# Altium PCB a4403-ELE_PCB.PcbDoc (part 1 of 5)
Units mm, origin at the board's own origin, x right, y up, seen from the top; angles counter-clockwise.
Board outline 160 x 110 mm, 4 copper layers (Top Layer, Int1 (GND), Int2 (PWR), Bottom Layer), stack 1.369 mm thick; 389 components, 298 nets, 1653 pads, 661 vias.
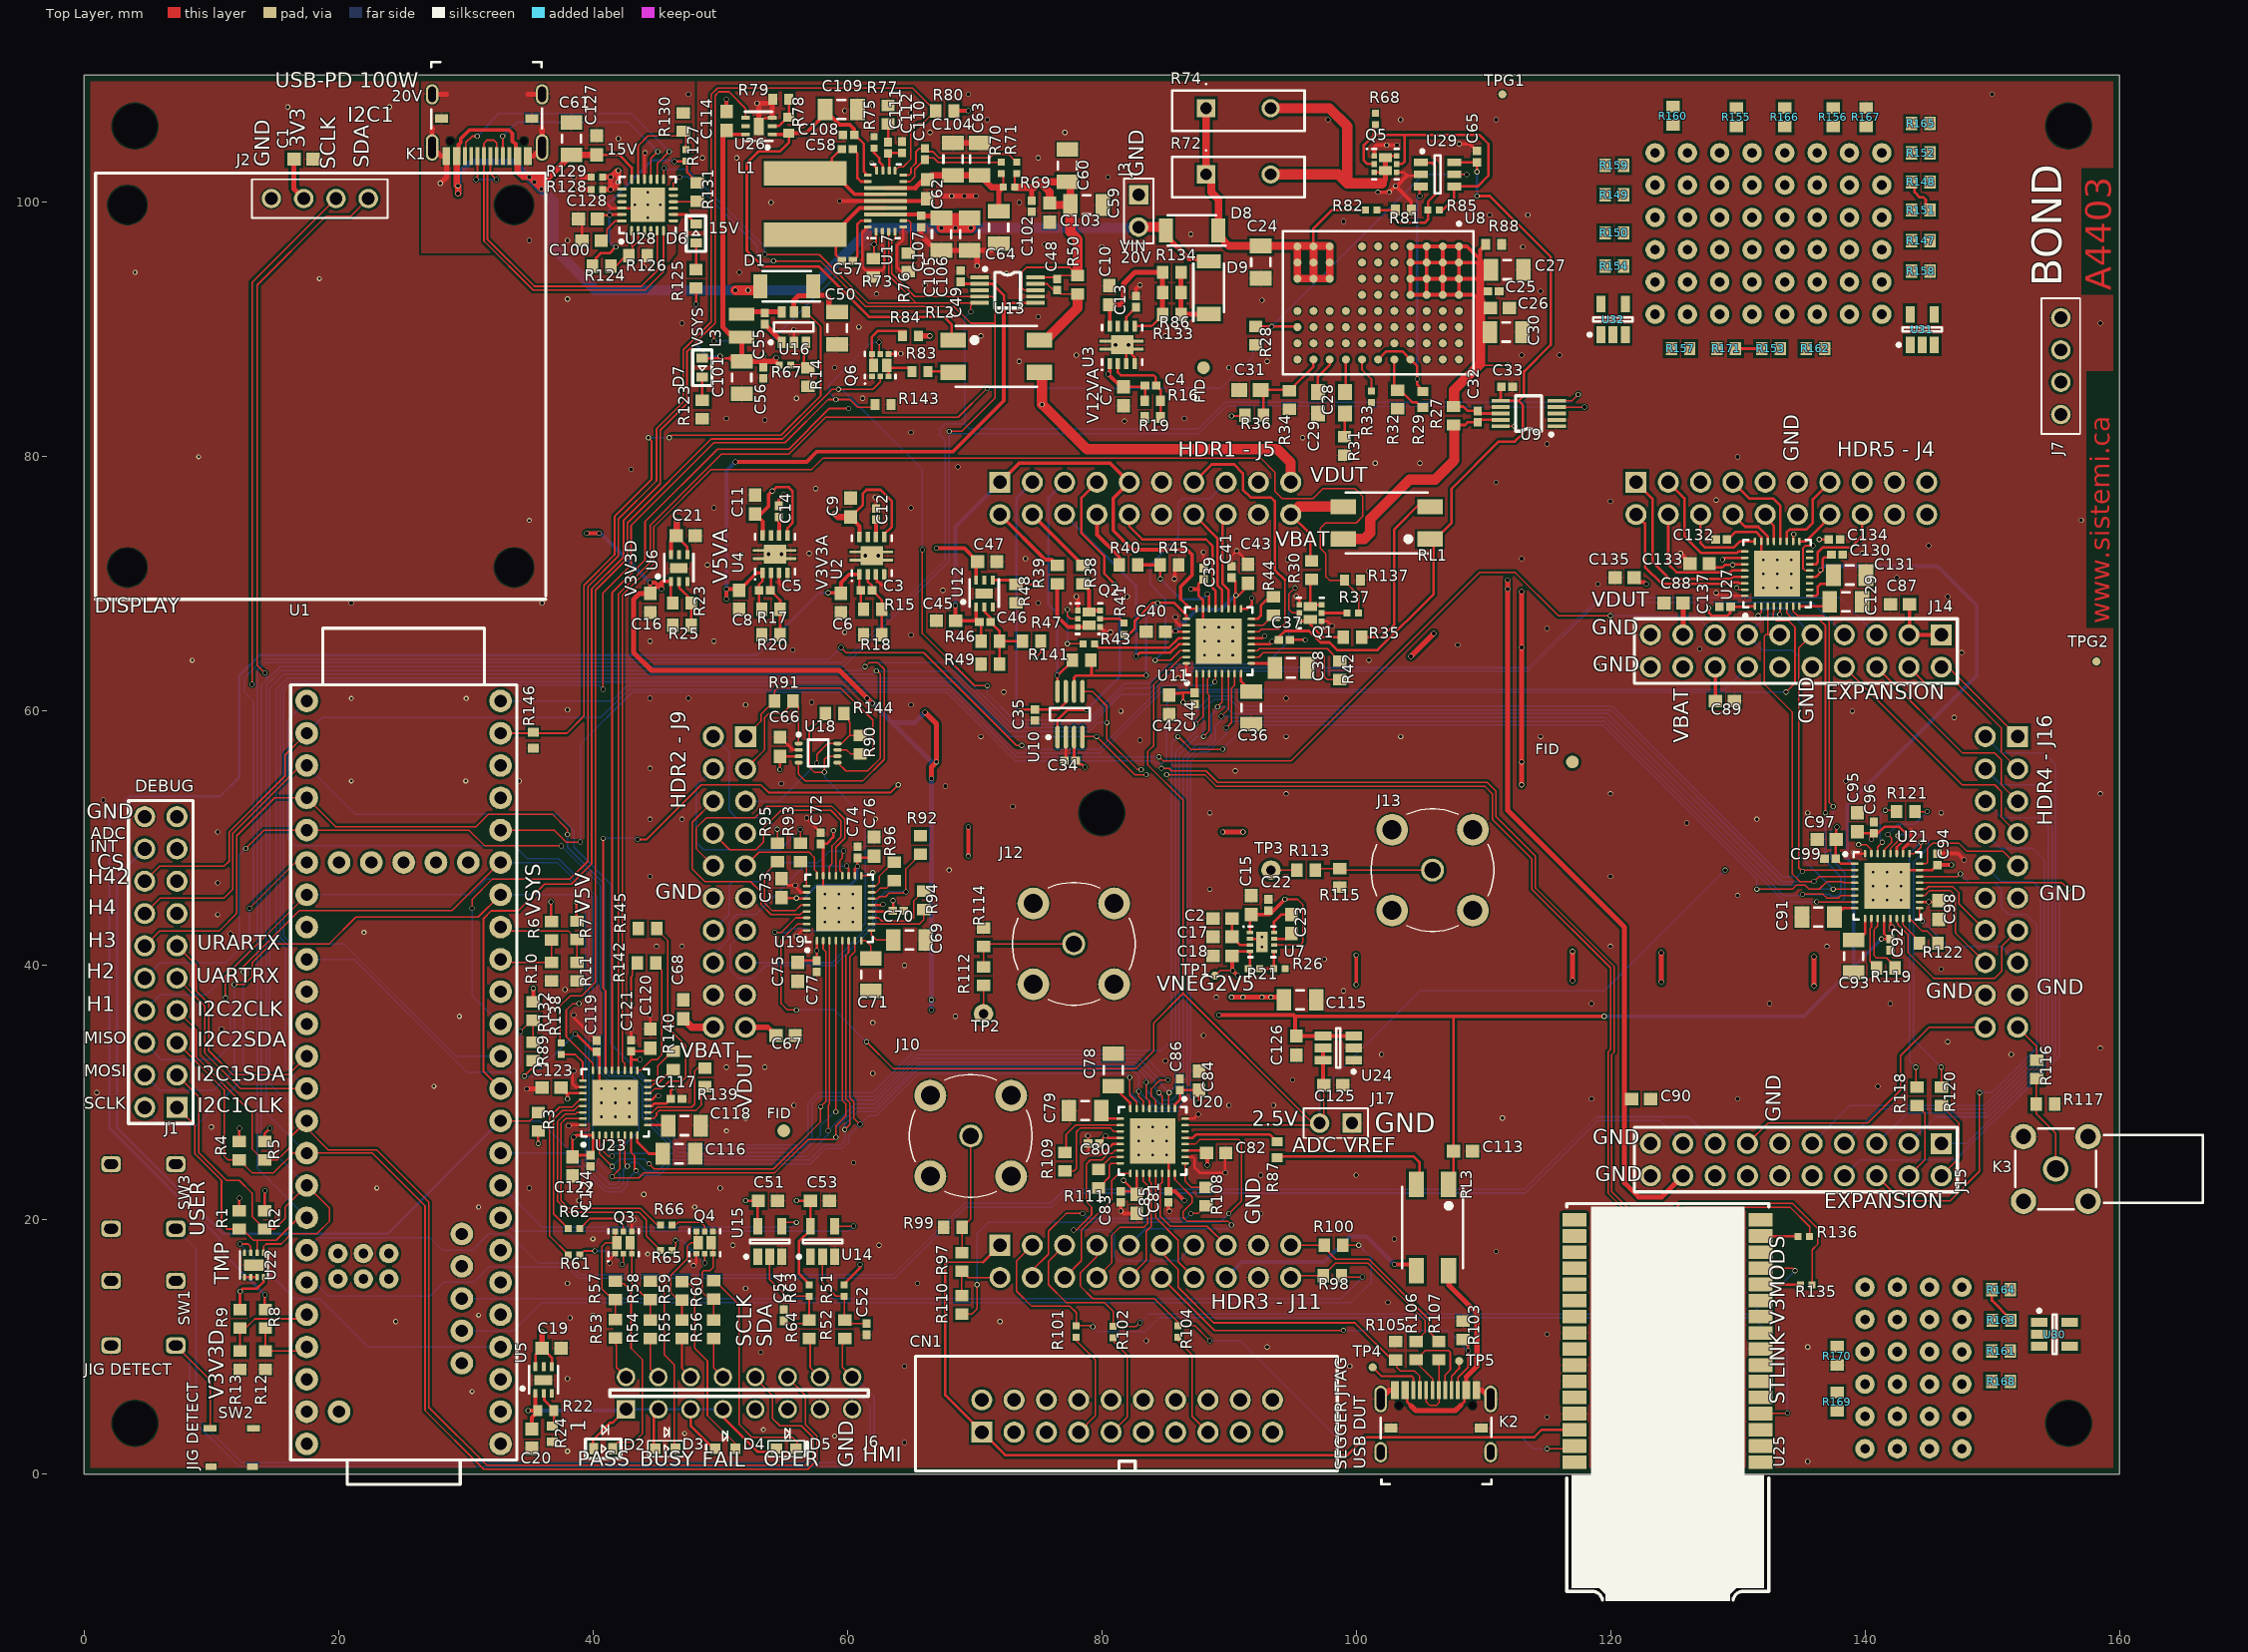
[diagram p0: Top Layer view]
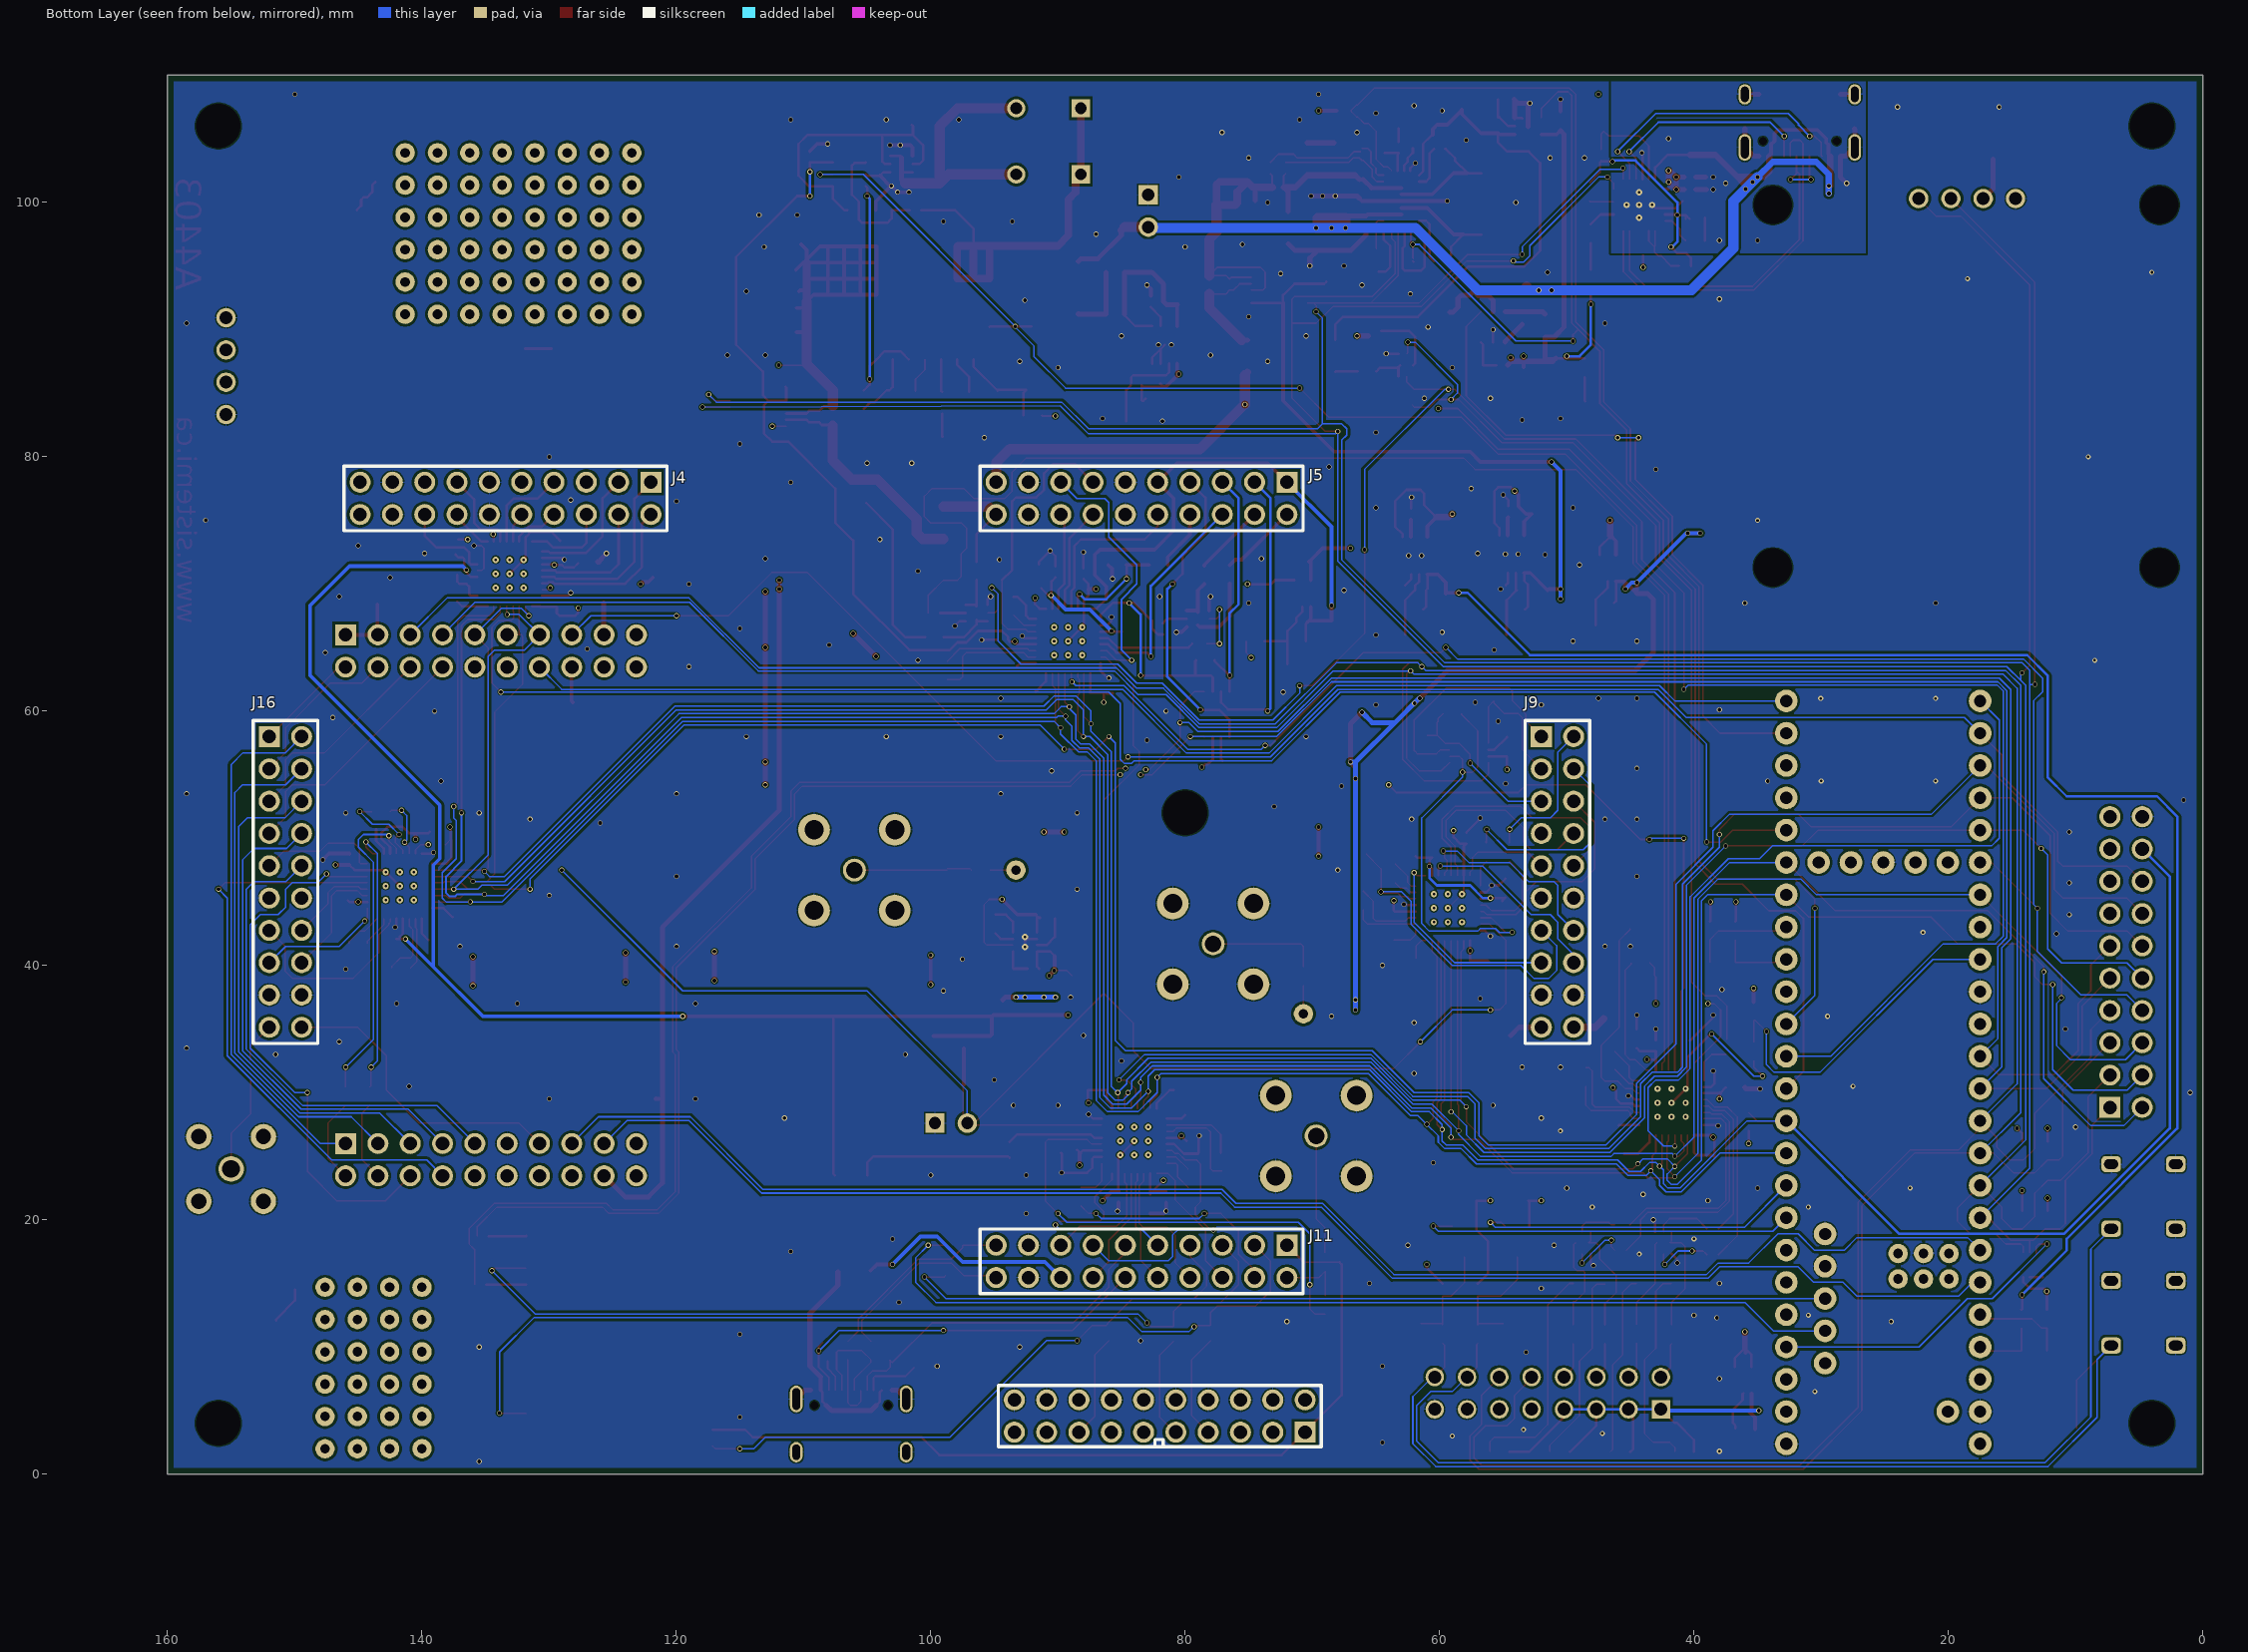
[diagram p1: Bottom Layer view, seen from below]
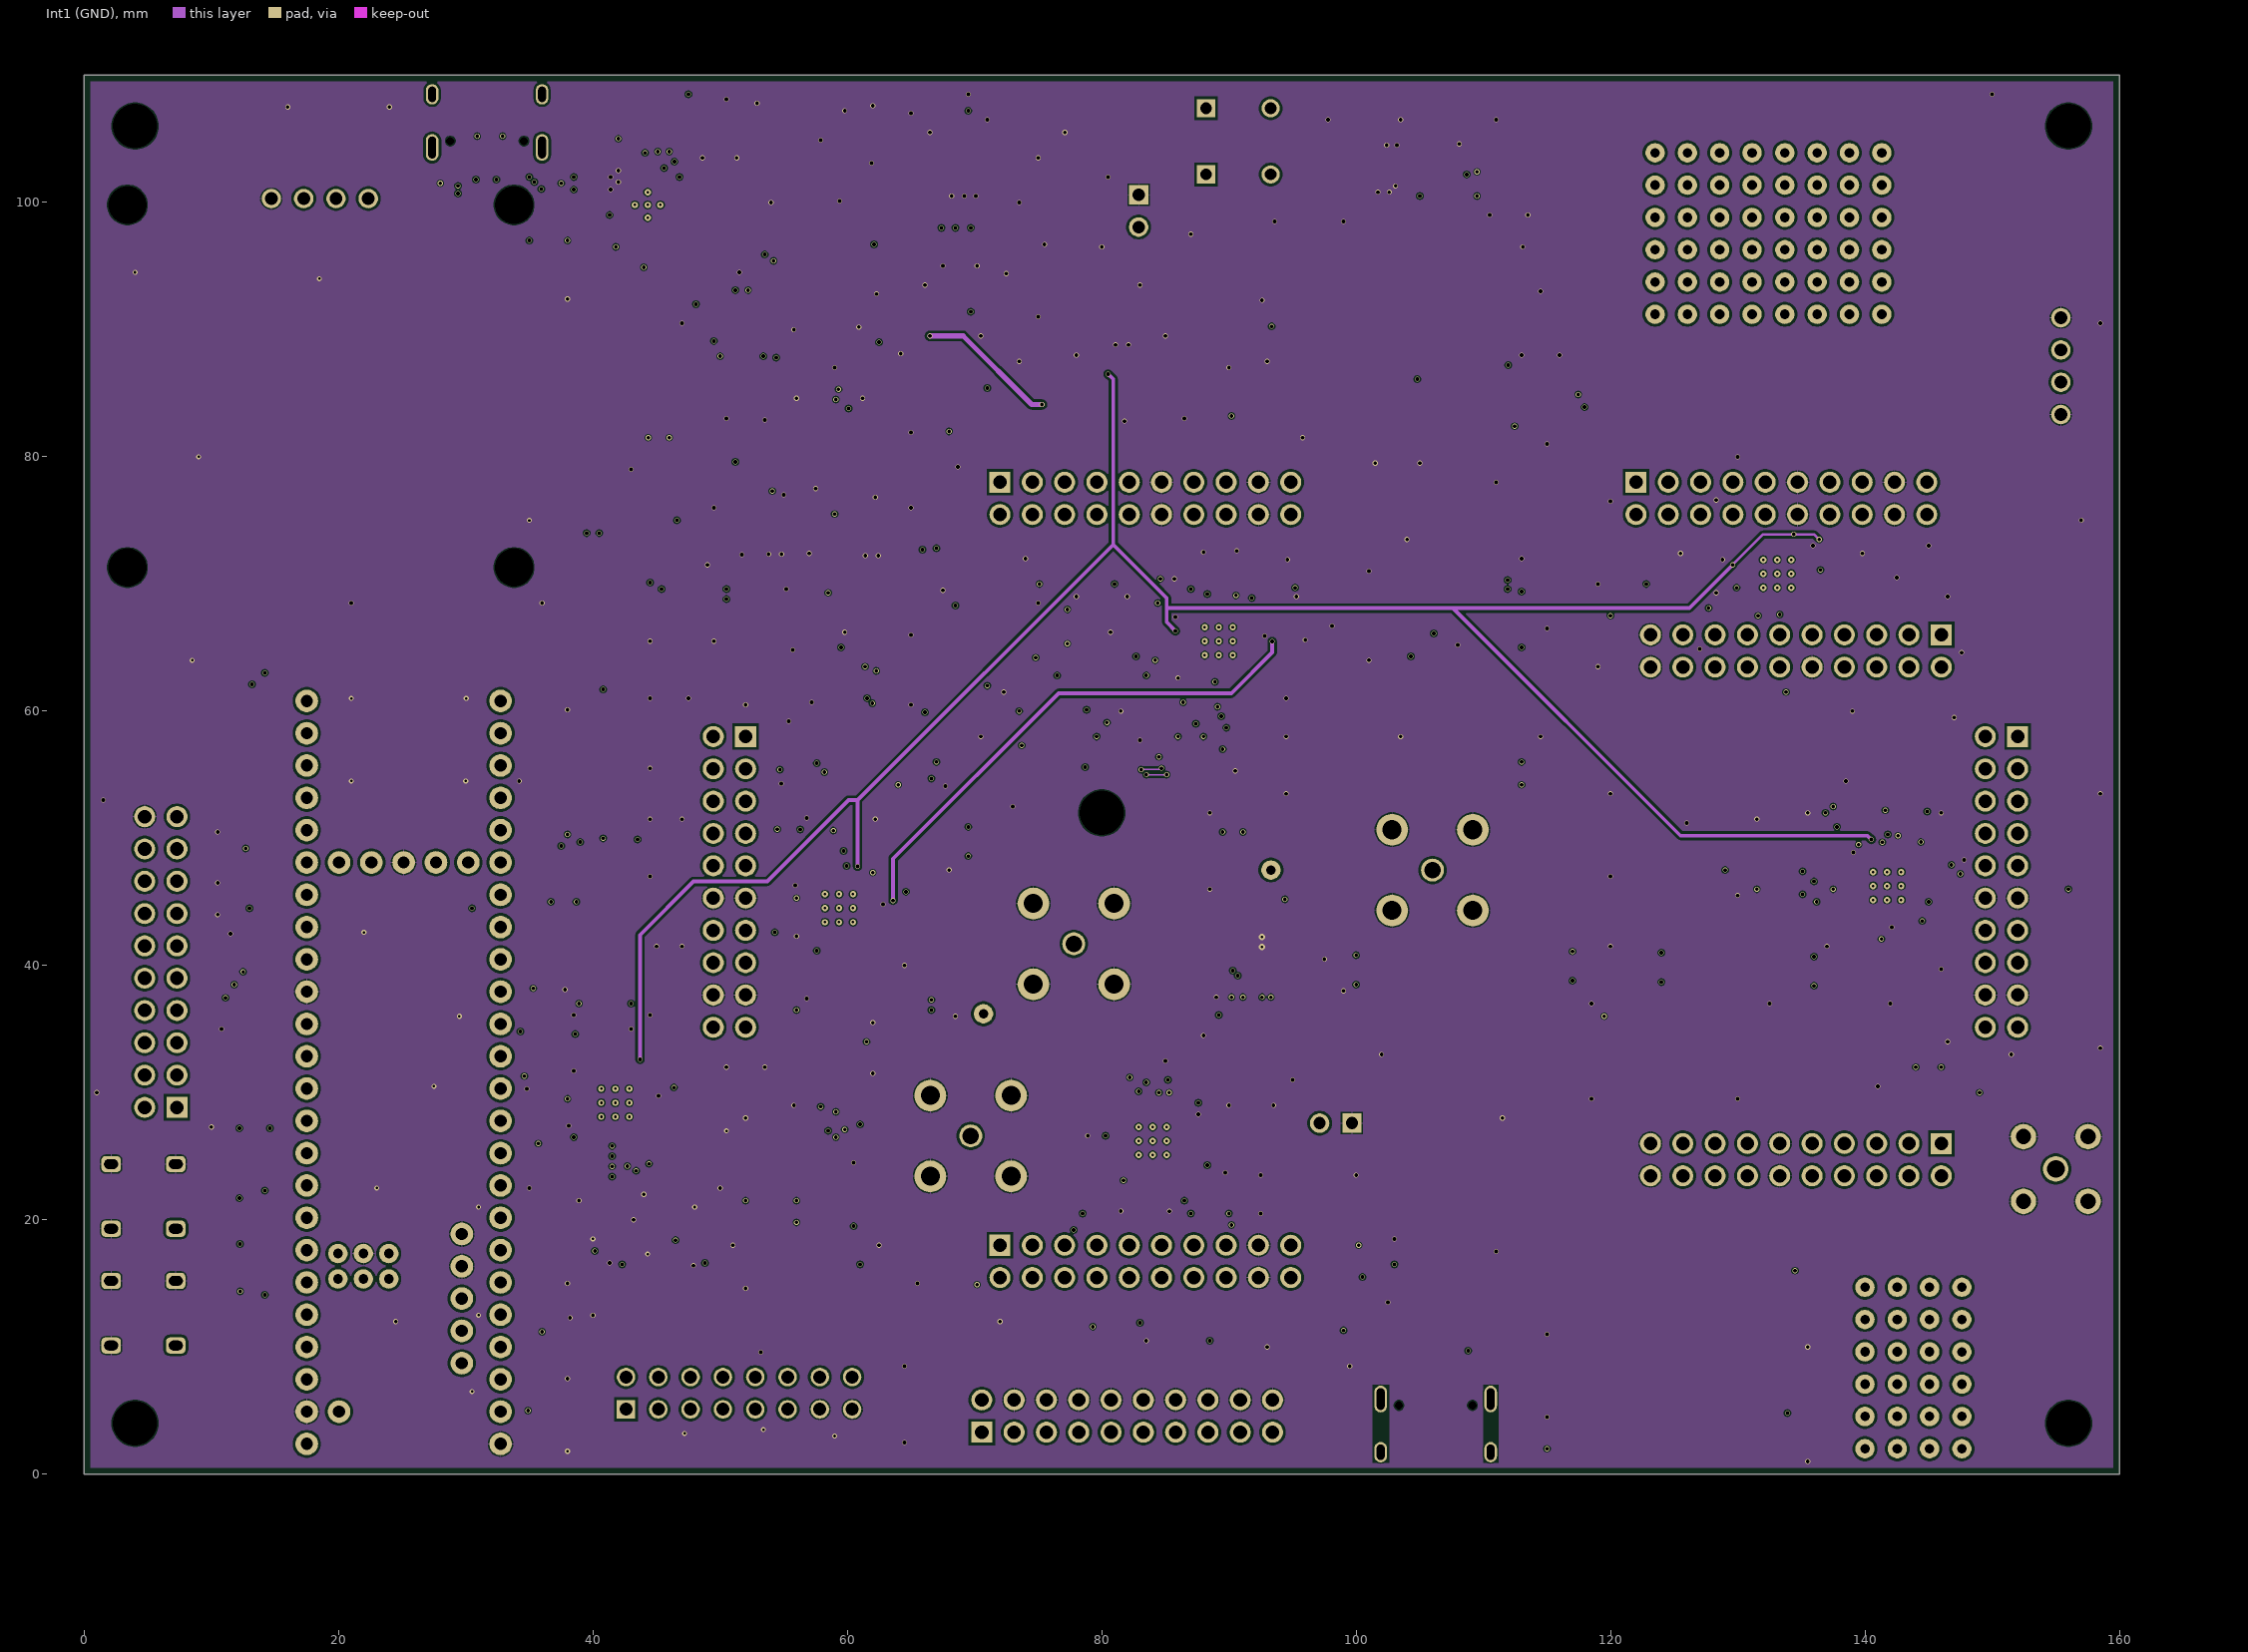
[diagram p2: Int1 (GND)]
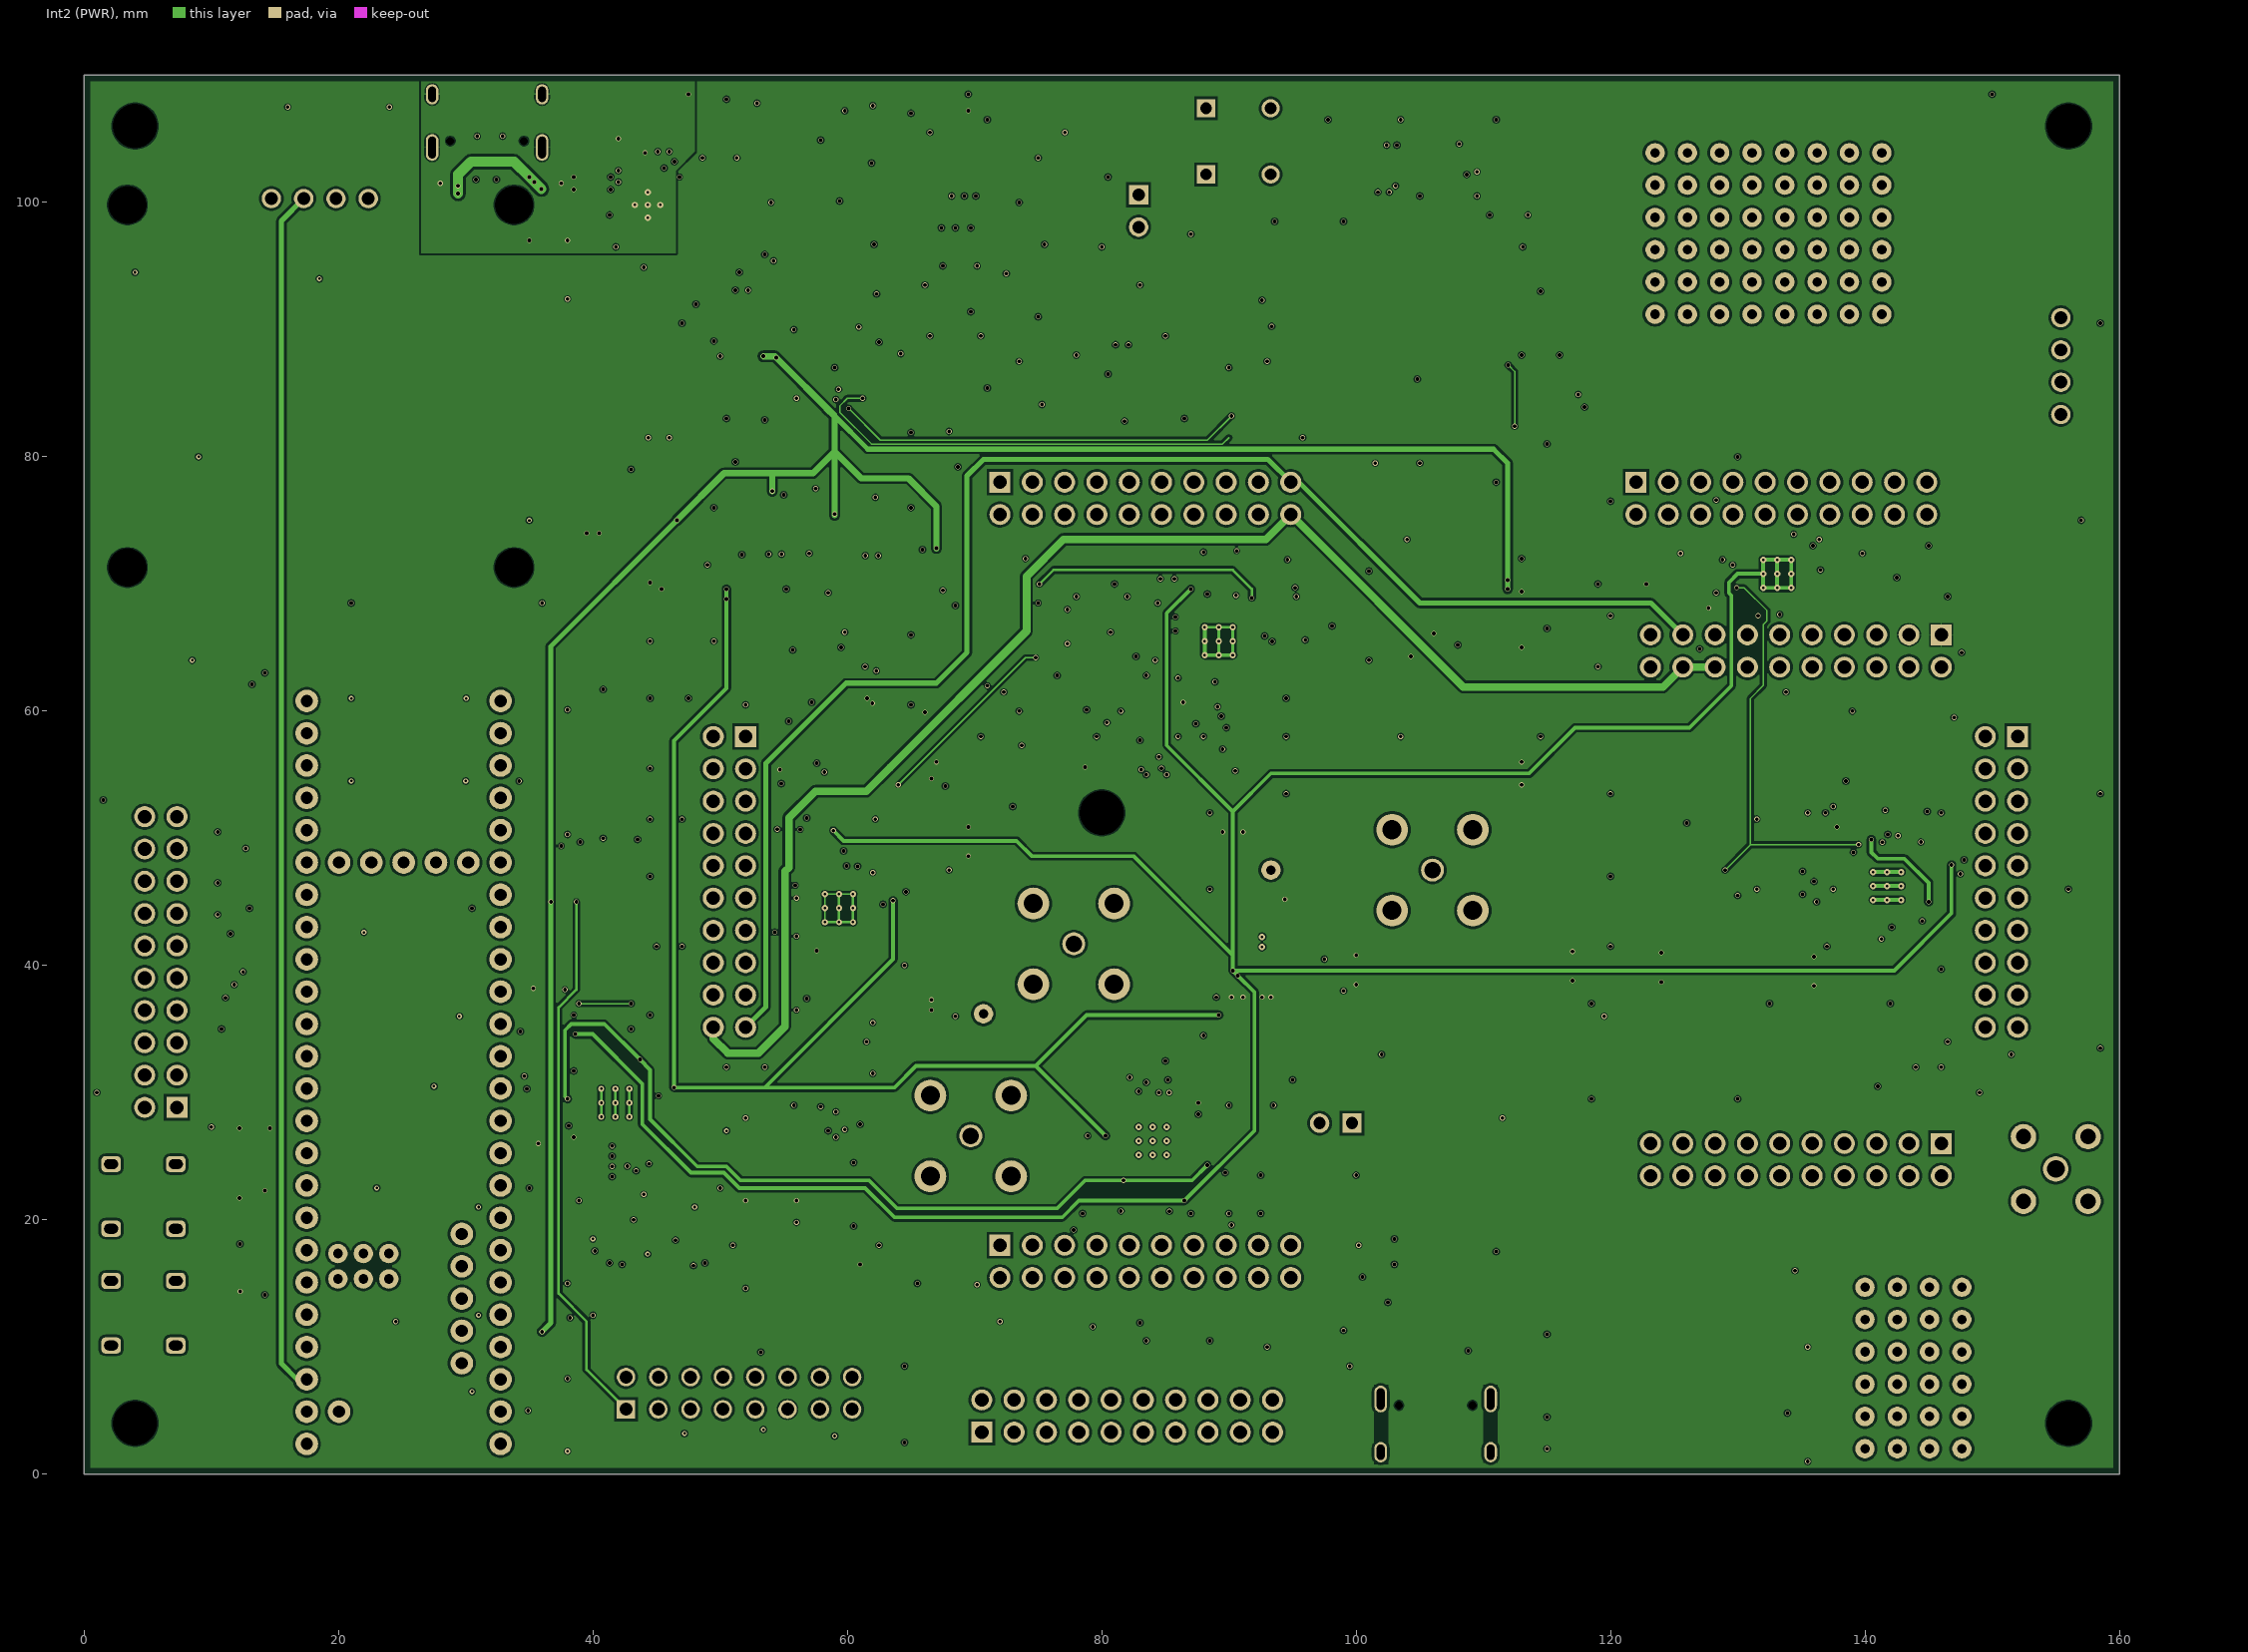
[diagram p3: Int2 (PWR)]
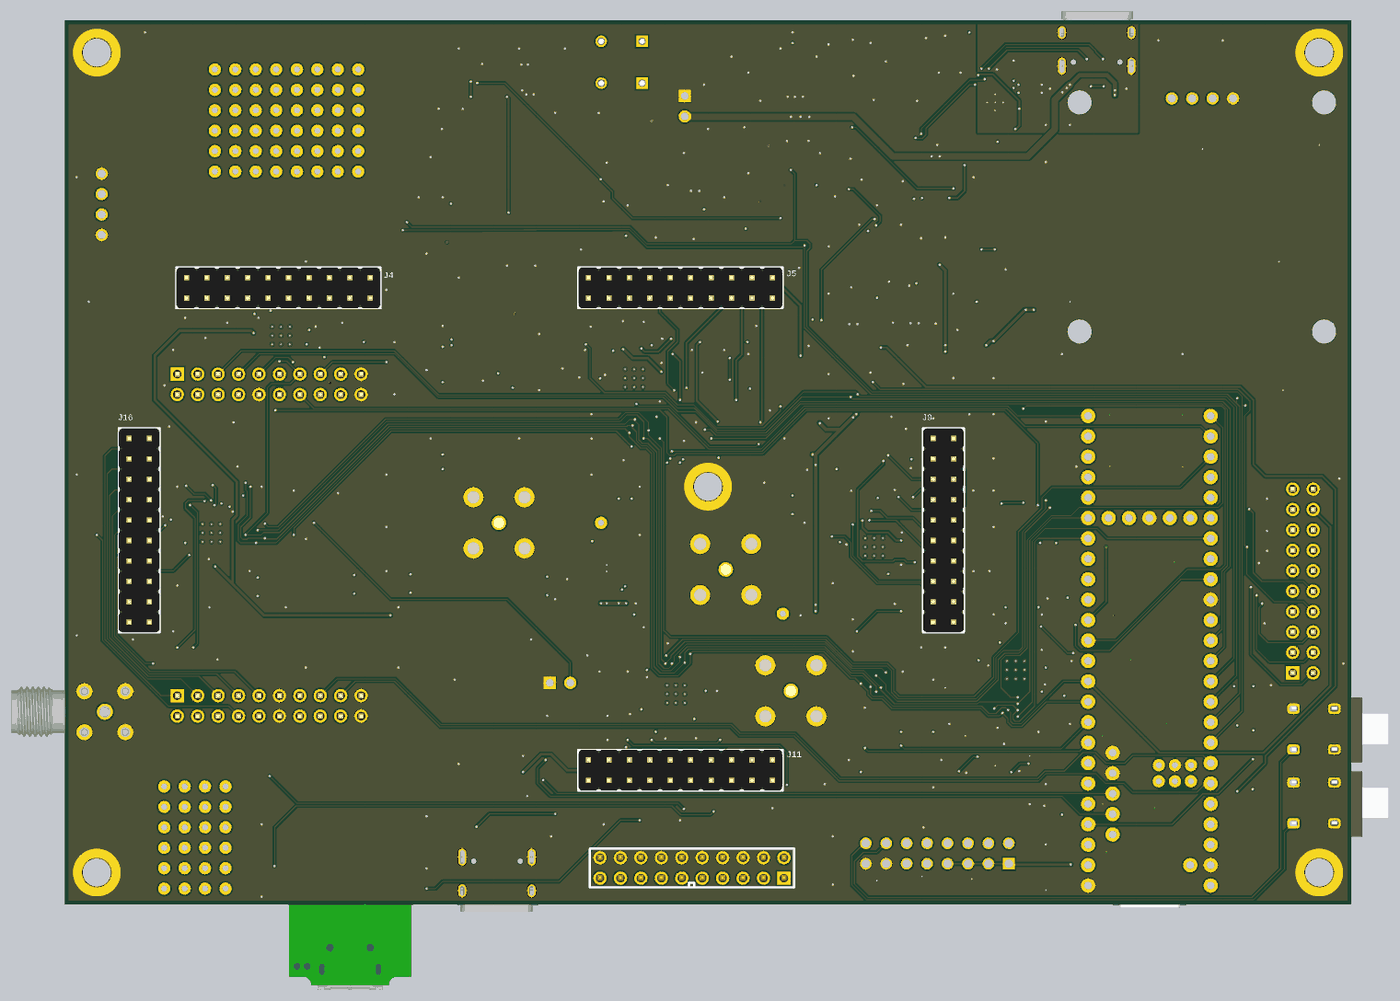
[diagram p7: 3D render of the assembled board from below, using the file's embedded part models]

## Layer stack, top to bottom
Top Solder: solder mask 0.0254, SM-001, Dk 4
Top Layer: signal copper 0.035
Dielectric 1: prepreg 0.1295, PP-017, Dk 4.3
Dielectric 2: prepreg 0.1295, PP-017, Dk 4.3
Int1 (GND): signal copper 0.035
Dielectric 3: core 0.7112, Core-039, Dk 4.8
Int2 (PWR): signal copper 0.035
Dielectric 4: prepreg 0.1295, PP-017, Dk 4.3
Dielectric 5: prepreg 0.1295, PP-017, Dk 4.3
Bottom Layer: signal copper 0.035
Bottom Solder: solder mask 0.0254, SM-001, Dk 4

## Board outline
0,0 0,110 160,110 160,0

## Design rules (kind name [scope] priority, off if disabled: settings)
BoardOutlineClearance [All] p1: gap=0.2 ignorepadtopadclearanceinfootprint=FALSE
Clearance Clearance_PA2 [InComponent('C213') OR InComponent('C215') OR InComponent('C216') OR InComponent('C218')     OR InComponent('C219')     OR InComponent('C220')     OR InComponent('C222')     OR InComponent('C223') OR InComponent('L200') OR InComponent('F200') OR InComponent('Q202') OR InComponent('Q203')OR InComponent('Q204')OR InComponent('Q205')OR InComponent('Q206')OR InComponent('Q207')] p1: gap=0.09 ignorepadtopadclearanceinfootprint=FALSE except(1: SMDPad-SMDPad SMDPad-THPad SMDPad-Via THPad-THPad THPad-Via)
Clearance Clearance_PA [InNet('PA_PST_L')] p2: gap=0.09 ignorepadtopadclearanceinfootprint=FALSE except(1: SMDPad-SMDPad)
Clearance [All] p3: gap=0.09 ignorepadtopadclearanceinfootprint=FALSE except(0.2: Arc-Fill Arc-Poly Arc-Region Track-Fill Track-Poly Track-Region SMDPad-Fill SMDPad-Poly SMDPad-Region THPad-Fill THPad-Poly THPad-Region Fill-Fill Fill-Poly Fill-Region Poly-Poly Poly-Region Region-Region)
HoleSize [All] p1: absolutevalues=TRUE maxlimit=6.3 minlimit=0.15 maxpercent=80.000 minpercent=20.000
MinimumSolderMaskSliver [All] p1: minsoldermaskwidth=0.05
PlaneClearance [All] p1: clearance=0.102
PlaneConnect PlaneConnectPowerPads [InPadClass('PowerPads')] p1: planeconnectstyle=Direct reliefexpansion=0.508 reliefentries=4 reliefconductorwidth=0.254 reliefairgap=0.254
PlaneConnect [All] p2: pad.planeconnectstyle=Relief pad.reliefexpansion=0.3 pad.reliefentries=4 pad.reliefconductorwidth=0.102 pad.reliefairgap=0.102 via.planeconnectstyle=Direct via.reliefexpansion=0.3 via.reliefentries=4 via.reliefconductorwidth=0.127 via.reliefairgap=0.127
PolygonConnect PolygonConnectPABOOST [All vs (InComponent('C410') OR InComponent('C411')  OR InComponent('C412') OR InComponent('C414')) OR (InComponent('C400') OR InComponent('C401')  OR InComponent('C402') OR InComponent('C403')) OR InComponent('J801') OR InComponent('C809') OR InComponent('C813')] p1: connectstyle=Direct reliefconductorwidth=0.254 reliefentries=4 polygonreliefangle="90 Angle" airgapwidth=0.254
PolygonConnect PolygonConnectPowerPads [InNetClass('PWR')] p2: connectstyle=Direct reliefconductorwidth=0.254 reliefentries=4 polygonreliefangle="90 Angle" airgapwidth=0.254
PolygonConnect [All] p3: thpad.connectstyle=Relief thpad.reliefconductorwidth=0.102 thpad.reliefentries=4 thpad.polygonreliefangle="90 Angle" thpad.airgapwidth=0.102 smdpad.connectstyle=Relief smdpad.reliefconductorwidth=0.102 smdpad.reliefentries=4 smdpad.polygonreliefangle="90 Angle" smdpad.airgapwidth=0.102 via.connectstyle=Direct via.reliefconductorwidth=0.127 via.reliefentries=4 via.polygonreliefangle="90 Angle" via.airgapwidth=0.127
RoutingVias [All] p1: holewidth=0.3 width=0.4 viastyle="Through Hole" minholewidth=0.15 minwidth=0.25 maxholewidth=2 maxwidth=10
SilkToSilkClearance [All] p1: silktosilkclearance=0.01
SilkToSolderMaskClearance [IsPad] p1: minsilkscreentomaskgap=0.01 clearancetoexposedcopper=TRUE
SolderMaskExpansion SolderMaskExpansionVia [IsVia] p1: expansion=0.102 istentingtop=TRUE
SolderMaskExpansion [All] p2: expansion=0.05 istentingtop=FALSE
SupplyNets "Schematic Supply Nets_12" [InNet('GNDU')] p1: voltage=0.000
SupplyNets "Schematic Supply Nets_11" [InNet('REF2V5')] p2: voltage=0.000
SupplyNets "Schematic Supply Nets_10" [InNet('V3V3D')] p3: voltage=0.000
SupplyNets "Schematic Supply Nets_9" [InNet('V5V')] p4: voltage=0.000
SupplyNets "Schematic Supply Nets_8" [InNet('GND')] p5: voltage=0.000
SupplyNets "Schematic Supply Nets_7" [InNet('VBAT')] p6: voltage=0.000
SupplyNets "Schematic Supply Nets_6" [InNet('VNEG2V5A')] p7: voltage=0.000
SupplyNets "Schematic Supply Nets_5" [InNet('V5VA')] p8: voltage=0.000
SupplyNets "Schematic Supply Nets_4" [InNet('V12VA')] p9: voltage=0.000
SupplyNets "Schematic Supply Nets_3" [InNet('VSYS')] p10: voltage=0.000
SupplyNets "Schematic Supply Nets_2" [InNet('VDUT')] p11: voltage=0.000
SupplyNets "Schematic Supply Nets_1" [InNet('VIN')] p12: voltage=0.000
SupplyNets "Schematic Supply Nets" [InNet('V3V3A')] p13: voltage=0.000
UnRoutedNet [All] p1: checkbadconnections=TRUE
Width WidthRF [InNetClass('RF')] p1: maxlimit=0.38 minlimit=0.254 preferedwidth=0.38 toplayer_minwidth=0.38 bottomlayer_minwidth=0.38 impedanceprofiledriven=TRUE impedanceprofileid={D1A07D62-F272-47C7-A329-54E711F923DC} minimp=50.000000 maximp=50.000000 favimp=50.000000
Width [All] p2: maxlimit=6 minlimit=0.089 preferedwidth=0.15
23 further rules are at their usual default settings.

## Components (designator, comment, footprint, x,y, rotation, side; value= is the part's Value field where it differs from the comment)
C1 "Samsung CL10B105KA8NNNC" CAPC1608X90X35NL15T15 17.25,103.4 r180 top
C2 "2.2 µF,±10%,25V,X7R,0603" CAPC1608X90X35NL15T15 89.5,43.7 r0 top
C3 "10 nF,±10%,25V,CGO,0402" CAPC1005X56X25NL10T15 61.5,69.5 r180 top
C4 "10 nF,±10%,25V,CGO,0402" CAPC1005X56X25NL10T15 83.84,85.6 r180 top
C5 "10 nF,±10%,25V,CGO,0402" CAPC1005X56X25NL10T15 53.5,69.5 r180 top
C6 "2.2 µF,±10%,25V,X7R,0603" CAPC1608X90X35NL15T15 59.5,68.5 r90 top
C7 "2.2 µF,±10%,25V,X7R,0603" CAPC1608X90X35NL15T15 81.7,84.75 r90 top
C8 "2.2 µF,±10%,25V,X7R,0603" CAPC1608X90X35NL15T15 51.5,68.75 r90 top
C9 "Samsung CL10B105KA8NNNC" CAPC1608X90X35NL15T15 60.25,76 r270 top
C10 "Samsung CL10B105KA8NNNC" CAPC1608X90X35NL15T15 80.6,92.7 r270 top
C11 "Samsung CL10B105KA8NNNC" CAPC1608X90X35NL15T15 52.75,76.25 r270 top
C12 "10 nF,±10%,25V,CGO,0402" CAPC1005X56X25NL10T15 62.25,75.5 r270 top
C13 "10 nF,±10%,25V,CGO,0402" CAPC1005X56X25NL10T15 82.7,92.2 r270 top
C14 "10 nF,±10%,25V,CGO,0402" CAPC1005X56X25NL10T15 54.6,75.7 r270 top
C15 "2.2 µF,±10%,25V,X7R,0603" CAPC1608X90X35NL15T15 91.75,44.75 r270 top
C16 "2.2 µF,±10%,25V,X7R,0603" CAPC1608X90X35NL15T15 44.5,68.5 r90 top
C17 "2.2 µF,±10%,25V,X7R,0603" CAPC1608X90X35NL15T15 89.5,42.25 r0 top
C18 "2.2 µF,±10%,25V,X7R,0603" CAPC1608X90X35NL15T15 89.5,40.75 r0 top
C19 "Samsung CL10B105KA8NNNC" CAPC1608X90X35NL15T15 36.75,9.9 r180 top
C20 "2.2 µF,±10%,25V,X7R,0603" CAPC1608X90X35NL15T15 35.2,2.8 r90 top
C21 "Samsung CL10B105KA8NNNC" CAPC1608X90X35NL15T15 47.3,73.8 r180 top
C22 "Samsung CL05B104KO5NNNC" CAPC1005X56X25NL10T15 93.1,44.76 r270 top
C23 "Samsung CL10B105KA8NNNC" CAPC1608X90X35NL15T15 94.9,43.25 r90 top
C24 "Murata GRM31CR61H106KA12L" CAPC3216X180X55LL20T25 92.5,95.3 r90 top
C25 "Samsung CL05B104KO5NNNC" CAPC1005X56X25NL10T15 110.8,93 r180 top
C26 "Samsung CL10B105KA8NNNC" CAPC1608X90X35NL15T15 111.3,91.7 r180 top
C27 "Murata GRM31CR61H106KA12L" CAPC3216X180X55LL20T25 111.875,94.7 r180 top
C28 "Generic CAP 0603" CAPC1608X90X35ML15T15 99.106,84.248 r90 top
C29 "Generic CAP 0603" CAPC1608X90X35ML15T15 97,84.25 r90 top
C30 "Murata GRM31CR61H106KA12L" CAPC3216X180X55LL20T25 111.8,89.8 r180 top
C31 "Generic CAP 0603" CAPC1608X90X35ML15T15 91.65,85.25 r0 top
C32 "10 nF,±10%,25V,CGO,0402" CAPC1005X56X25NL10T15 109.56,83.16 r90 top
C33 "Samsung CL05B104KO5NNNC" CAPC1005X56X25NL10T15 111.86,85.5 r180 top
C34 "Samsung CL05B104KO5NNNC" CAPC1005X56X25NL10T15 77.5,56.1 r0 top
C35 "Samsung CL05B104KO5NNNC" CAPC1005X56X25NL10T15 74.75,59.69 r270 top
C36 "Murata GRM31CR61H106KA12L" CAPC3216X180X55LL20T25 91.75,60.25 r90 top
C37 "Samsung CL05B104KO5NNNC" CAPC1005X56X25NL10T15 94.36,65.6 r0 top
C38 "Murata GRM31CR61H106KA12L" CAPC3216X180X55LL20T25 94.875,63.4 r180 top
C39 "Samsung CL05B104KO5NNNC" CAPC1005X56X25NL10T15 88,70.8 r90 top
C40 "Samsung CL10B105KA8NNNC" CAPC1608X90X35NL15T15 84.25,66.25 r0 top
C41 "Samsung CL05B104KO5NNNC" CAPC1005X56X25NL10T15 90.2,70.94 r90 top
C42 "Samsung CL10B105KA8NNNC" CAPC1608X90X35NL15T15 85.3,60.5 r90 top
C43 "Samsung CL10B105KA8NNNC" CAPC1608X90X35NL15T15 91.5,70.8 r270 top
C44 "Samsung CL05B104KO5NNNC" CAPC1005X56X25NL10T15 87.3,61 r270 top
C45 "2.2 µF,±10%,25V,X7R,0603" CAPC1608X90X35NL15T15 67.75,67.1 r0 top
C46 "10 nF,±10%,25V,CGO,0402" CAPC1005X56X25NL10T15 70.81,67 r180 top
C47 "Samsung CL10B105KA8NNNC" CAPC1608X90X35NL15T15 71,71.75 r180 top
C48 "10 nF,±10%,25V,CGO,0402" CAPC1005X56X25NL10T15 76.5,93.54 r90 top
C49 "Samsung CL05B104KO5NNNC" CAPC1005X56X25NL10T15 68.9,94.2 r270 top
C50 "Murata GRM31CR61H106KA12L" CAPC3216X180X55LL20T25 59.2,90.1 r90 top
C51 "Samsung CL10B105KA8NNNC" CAPC1608X90X35NL15T15 53.75,21.5 r180 top
C52 "Samsung CL05B104KO5NNNC" CAPC1005X56X25NL10T15 61.5,11.4 r270 top
C53 "Samsung CL10B105KA8NNNC" CAPC1608X90X35NL15T15 57.85,21.5 r180 top
C54 "Samsung CL05B104KO5NNNC" CAPC1005X56X25NL10T15 55,12.5 r90 top
C55 "Samsung CL05B104KO5NNNC" CAPC1005X56X25NL10T15 53.5,90.86 r270 top
C56 "Samsung CL05B104KO5NNNC" CAPC1005X56X25NL10T15 53.4,86.6 r270 top
C57 "Samsung CL05B104KO5NNNC" CAPC1005X56X25NL10T15 60,95.4 r180 top
C58 "Samsung CL05B104KO5NNNC" CAPC1005X56X25NL10T15 60,104.2 r180 top
C59 "Murata GRM31CR61H106KA12L" CAPC3216X180X55LL20T25 78.8,99.8 r0 top
C60 "Murata GRM31CR61H106KA12L" CAPC3216X180X55LL20T25 77.3,102.9 r90 top
C61 "Murata GRM31CR61H106KA12L" CAPC3216X180X55LL20T25 38.3,105 r270 top
C62 "Samsung CL10B105KA8NNNC" CAPC1608X90X35NL15T15 66.3,101.05 r270 top
C63 "Murata GRM31CR61H106KA12L" CAPC3216X180X55LL20T25 70.4,103.4 r90 top
C64 "Murata GRM31CR61H106KA12L" CAPC3216X180X55LL20T25 71.9,98.025 r270 top
C65 "Samsung CL05B104KO5NNNC" CAPC1005X56X25NL10T15 109.5,103.6 r270 top
C66 "Samsung CL10B105KA8NNNC" CAPC1608X90X35NL15T15 54.7,57.2 r270 top
C67 "Samsung CL10B105KA8NNNC" CAPC1608X90X35NL15T15 55.15,34.5 r180 top
C68 "Samsung CL10B105KA8NNNC" CAPC1608X90X35NL15T15 47.1,36.55 r270 top
C69 "Murata GRM31CR61H106KA12L" CAPC3216X180X55LL20T25 64.875,42 r180 top
C70 "Samsung CL05B104KO5NNNC" CAPC1005X56X25NL10T15 64,44.3 r0 top
C71 "Murata GRM31CR61H106KA12L" CAPC3216X180X55LL20T25 61.85,39.275 r90 top
C72 "Samsung CL05B104KO5NNNC" CAPC1005X56X25NL10T15 57.9,50 r90 top
C73 "Samsung CL10B105KA8NNNC" CAPC1608X90X35NL15T15 54.825,46.075 r270 top
C74 "Samsung CL05B104KO5NNNC" CAPC1005X56X25NL10T15 60.8,48.9 r90 top
C75 "Samsung CL10B105KA8NNNC" CAPC1608X90X35NL15T15 56.1,39.5 r90 top
C76 "Samsung CL10B105KA8NNNC" CAPC1608X90X35NL15T15 62.1,49.35 r270 top
C77 "Samsung CL05B104KO5NNNC" CAPC1005X56X25NL10T15 57.6,39.94 r270 top
C78 "Murata GRM31CR61H106KA12L" CAPC3216X180X55LL20T25 80.9,31.775 r270 top
C79 "Murata GRM31CR61H106KA12L" CAPC3216X180X55LL20T25 78.7,28.6 r0 top
C80 "Samsung CL05B104KO5NNNC" CAPC1005X56X25NL10T15 79.37,26 r180 top
C81 "Samsung CL05B104KO5NNNC" CAPC1005X56X25NL10T15 85.25,21.81 r270 top
C82 "Samsung CL10B105KA8NNNC" CAPC1608X90X35NL15T15 89,25.25 r180 top
C83 "Samsung CL05B104KO5NNNC" CAPC1005X56X25NL10T15 81.5,21.81 r270 top
C84 "Samsung CL10B105KA8NNNC" CAPC1608X90X35NL15T15 87.65,30.95 r270 top
C85 "Samsung CL10B105KA8NNNC" CAPC1608X90X35NL15T15 82.75,21.25 r90 top
C86 "Samsung CL05B104KO5NNNC" CAPC1005X56X25NL10T15 86.15,30.64 r90 top
C87 "Samsung CL10B105KA8NNNC" CAPC1608X90X35NL15T15 142.75,68.4 r0 top
C88 "Samsung CL10B105KA8NNNC" CAPC1608X90X35NL15T15 124.95,68.5 r0 top
C89 "Samsung CL10B105KA8NNNC" CAPC1608X90X35NL15T15 129,60.8 r180 top
C90 "Samsung CL10B105KA8NNNC" CAPC1608X90X35NL15T15 122.4,29.5 r180 top
C91 "Murata GRM31CR61H106KA12L" CAPC3216X180X55LL20T25 136.325,43.8 r0 top
C92 "Samsung CL05B104KO5NNNC" CAPC1005X56X25NL10T15 142,41.64 r270 top
C93 "Murata GRM31CR61H106KA12L" CAPC3216X180X55LL20T25 139.1,40.725 r90 top
C94 "Samsung CL05B104KO5NNNC" CAPC1005X56X25NL10T15 145.7,48.34 r90 top
C95 "Samsung CL10B105KA8NNNC" CAPC1608X90X35NL15T15 139.4,51.25 r270 top
C96 "Samsung CL05B104KO5NNNC" CAPC1005X56X25NL10T15 140.7,50.84 r90 top
C97 "Samsung CL10B105KA8NNNC" CAPC1608X90X35NL15T15 137,49.9 r0 top
C98 "Samsung CL10B105KA8NNNC" CAPC1608X90X35NL15T15 145.8,44.35 r90 top
C99 "Samsung CL05B104KO5NNNC" CAPC1005X56X25NL10T15 137.26,48.4 r180 top
C100 "Samsung CL10B105KA8NNNC" CAPC1608X90X35NL15T15 39.9,97 r0 top
C101 "Murata GRM31CR61H106KA12L" CAPC3216X180X55LL20T25 51.7,86.225 r90 top
C102 "Samsung CL05B104KO5NNNC" CAPC1005X56X25NL10T15 74.5,99.7 r270 top
C103 "Samsung CL10B105KA8NNNC" CAPC1608X90X35NL15T15 75.9,99.2 r270 top
C104 "Murata GRM31CR61H106KA12L" CAPC3216X180X55LL20T25 68.3,103.4 r90 top
C105 "Murata GRM31CR61H106KA12L" CAPC3216X180X55LL20T25 67.4,97.5 r90 top
C106 "Murata GRM31CR61H106KA12L" CAPC3216X180X55LL20T25 69.6,97.5 r90 top
C107 "Samsung CL05B104KO5NNNC" CAPC1005X56X25NL10T15 65.8,98.5 r90 top
C108 "Samsung CL05B104KO5NNNC" CAPC1005X56X25NL10T15 60.1,105.3 r0 top
C109 "Murata GRM31CR61H106KA12L" CAPC3216X180X55LL20T25 59.525,107.3 r180 top
C110 "Samsung CL05B104KO5NNNC" CAPC1005X56X25NL10T15 66.1,103.8 r270 top
C111 "15 nF,±10%,25V,CGO,0402" CAPC1005X56X25NL10T15 63.2,104.3 r270 top
C112 "DNP,±10%,25V,CGO,0402" CAPC1005X56X25NL10T15 64.3,104.34 r270 top
C113 "Samsung CL10B105KA8NNNC" CAPC1608X90X35NL15T15 108.4,25.4 r180 top
C114 "Samsung CL10B105KA8NNNC" CAPC1608X90X35NL15T15 50.5,106.4 r270 top
C115 "Murata GRM31CR61H106KA12L" CAPC3216X180X55LL20T25 95.6,37.3 r180 top
C116 "Murata GRM31CR61H106KA12L" CAPC3216X180X55LL20T25 46.775,25.2 r180 top
C117 "Samsung CL05B104KO5NNNC" CAPC1005X56X25NL10T15 46.56,29.5 r0 top
C118 "Murata GRM31CR61H106KA12L" CAPC3216X180X55LL20T25 47.2,27.4 r180 top
C119 "Samsung CL05B104KO5NNNC" CAPC1005X56X25NL10T15 40.3,33.66 r90 top
C120 "Samsung CL10B105KA8NNNC" CAPC1608X90X35NL15T15 44.5,34.25 r270 top
C121 "Samsung CL05B104KO5NNNC" CAPC1005X56X25NL10T15 43,33.69 r90 top
C122 "Samsung CL10B105KA8NNNC" CAPC1608X90X35NL15T15 38.4,24.2 r90 top
C123 "Samsung CL10B105KA8NNNC" CAPC1608X90X35NL15T15 36.75,30.4 r0 top
C124 "Samsung CL05B104KO5NNNC" CAPC1005X56X25NL10T15 39.8,24.64 r270 top
C125 "Samsung CL10B105KA8NNNC" CAPC1608X90X35NL15T15 98.2,30.6 r180 top
C126 "Samsung CL10B105KA8NNNC" CAPC1608X90X35NL15T15 95.3,33.7 r90 top
C127 "Samsung CL10B105KA8NNNC" CAPC1608X90X35NL15T15 40.3,104.5 r270 top
C128 "Samsung CL10B105KA8NNNC" CAPC1608X90X35NL15T15 39.6,98.7 r0 top
C129 "Murata GRM31CR61H106KA12L" CAPC3216X180X55LL20T25 138.5,68.6 r180 top
C130 "Samsung CL05B104KO5NNNC" CAPC1005X56X25NL10T15 137.8,72.3 r0 top
C131 "Murata GRM31CR61H106KA12L" CAPC3216X180X55LL20T25 138.8,70.7 r180 top
C132 "Samsung CL05B104KO5NNNC" CAPC1005X56X25NL10T15 128.7,73.5 r180 top
C133 "Samsung CL10B105KA8NNNC" CAPC1608X90X35NL15T15 127,71.6 r0 top
C134 "Samsung CL05B104KO5NNNC" CAPC1005X56X25NL10T15 137.6,73.5 r0 top
C135 "Samsung CL10B105KA8NNNC" CAPC1608X90X35NL15T15 121.1,70.5 r0 top
C137 "Samsung CL05B104KO5NNNC" CAPC1005X56X25NL10T15 129,68.2 r180 top
CN1 "20P 2.54mm-Box Header" PCB-h3ow9p0wpqltbs651onh-1 82,4.57 r0 top
D1 "STTH2R02AFY" SODFL4724X103N 55.225,93.4 r180 top
D2 "Würth Elektronik 150060GS75000" PCB-5fu3j7c0qqekthrt71i6-1 40.8,2 r180 top
D3 "Würth Elektronik 150060YS75000" PCB-zc2vv3u4p0giaiwimi3e-1 45.7,2 r180 top
D4 "Wurth Elektronik 150060RS75003" "Wurth Elektronik 150060RS75003-Footprint-1" 50.4,2 r0 top
D5 "Wurth Elektronik 150060BS75003" 0603D_C 55.2,2 r0 top
D6 "Würth Elektronik 150060GS75000" PCB-5fu3j7c0qqekthrt71i6-1 48.1,97.55 r270 top
D7 "Würth Elektronik 150060GS75000" PCB-5fu3j7c0qqekthrt71i6-1 48.6,87 r90 top
D8 "STTH2R02AFY" SODFL4724X103N 87.1,97.8 r180 top
D9 "STTH2R02AFY" SODFL4724X103N 88.4,93.3 r90 top
J1 "Würth Elektronik 61302021121" PCB-nk6cd1c3p7lqby8wsdwb-1 6.157,40.143 r90 top
J2 "4x1 Header" PCB-frzzw7wnfsmgwg7mpl31-1 15.99,99.03 r0 top
J3 "TE Connectivity / AMP 5-146280-2" PCB-nx47vqovjjduu8dkc1uz-1 82.9,99.33 r270 top
J4 "Würth Elektronik 61302021121" PCB-nk6cd1c3p7lqby8wsdwb-1 133.303,76.857 r0 bottom
J5 "Würth Elektronik 61302021121" PCB-nk6cd1c3p7lqby8wsdwb-1 83.303,76.857 r0 bottom
J6 "FCI 68602-116HLF" HEADER8X2 42.6,5.1 r90 top
J7 "4x1 Header" PCB-frzzw7wnfsmgwg7mpl31-1 154.13,89.67 r270 top
J9 "Würth Elektronik 61302021121" PCB-nk6cd1c3p7lqby8wsdwb-1 50.857,46.697 r270 bottom
J10 "Amphenol RF 112404" PCB-bfdufqe5asedaz2dexug-1 66.525,23.425 r0 top
J11 "Würth Elektronik 61302021121" PCB-nk6cd1c3p7lqby8wsdwb-1 83.303,16.857 r0 bottom
J12 "Amphenol RF 112404" PCB-bfdufqe5asedaz2dexug-1 74.625,38.525 r0 top
J13 "Amphenol RF 112404" PCB-bfdufqe5asedaz2dexug-1 102.825,44.325 r0 top
J14 "Würth Elektronik 61302021121" PCB-nk6cd1c3p7lqby8wsdwb-1 134.697,64.857 r180 top
J15 "Würth Elektronik 61302021121" PCB-nk6cd1c3p7lqby8wsdwb-1 134.697,24.857 r180 top
J16 "Würth Elektronik 61302021121" PCB-nk6cd1c3p7lqby8wsdwb-1 150.857,46.697 r270 bottom
J17 "TE Connectivity / AMP 5-146280-2" PCB-nx47vqovjjduu8dkc1uz-1 98.4,27.6 r180 top
K1 "USB-C 3.1 16 Pin Right Angle Connector" PCB-ld6ppm2v3fcnldhcn63r-1 36,111.1 r180 top
K2 "USB-C 3.1 16 Pin Right Angle Connector" PCB-ld6ppm2v3fcnldhcn63r-1 101.93,-0.87 r0 top
K3 "Molex 73391-0083" PCB-bfde39zrvmm7lhgxtykn-1 155,24 r270 top
L1 "Coilcraft XAL7070-472MEB" PCB-mw0ri1kelkujqd8k45jk-1 56.7,99.887 r270 top
L3 "SDCL1V2010-100M-R" PCB-3ir64hapazioc2jy0mm2-1 51.7,90.3 r90 top
Q1 "Rohm UT6K3TCR" DFN2020-8D 96.4,67.715 r180 top
Q2 "Rohm UT6K3TCR" DFN2020-8D 79,67.265 r0 top
Q3 "Rohm UT6K3TCR" DFN2020-8D 42.4,18.2 r90 top
Q4 "Rohm UT6K3TCR" DFN2020-8D 48.785,18.2 r90 top
Q5 "Rohm UT6K3TCR" DFN2020-8D 102.3,103.015 r0 top
Q6 "Rohm UT6K3TCR" DFN2020-8D 62.585,87.2 r90 top
R1 "Generic RES 0603" RESC1608X55X30ML15T15 12.2,20 r90 top
R2 "Generic RES 0603" RESC1608X55X30ML15T15 14.2,20 r90 top
R3 "Generic RES 0603" RESC1608X55X30ML15T15 35.7,27.7 r90 top
R4 "Generic RES 0603" RESC1608X55X30ML15T15 12.2,25.425 r90 top
R5 "Generic RES 0603" RESC1608X55X30ML15T15 14.2,25.425 r90 top
R6 "Generic RES 0603" RESC1608X55X30ML15T15 36.75,42.725 r90 top
R7 "Generic RES 0603" RESC1608X55X30ML15T15 38.75,42.75 r90 top
R8 "Generic RES 0603" RESC1608X55X30ML15T15 14.25,12.225 r90 top
R9 "Generic RES 0603" RESC1608X55X30ML15T15 12.25,12.225 r90 top
R10 "Generic RES 0603" RESC1608X55X30ML15T15 36.75,39.525 r90 top
R11 "Generic RES 0603" RESC1608X55X30ML15T15 38.75,39.525 r90 top
R12 "Generic RES 0603" RESC1608X55X30ML15T15 14.25,8.975 r90 top
R13 "Generic RES 0603" RESC1608X55X30ML15T15 12.25,8.975 r90 top
R14 "Generic RES 0603" RESC1608X55X30ML15T15 56.9,86.275 r90 top
R15 "Generic RES 0603" RESC1608X55X30ML15T15 62,68 r180 top
R16 "Generic RES 0603" RESC1608X55X30LL15T15 84,84.4 r180 top
R17 "Generic RES 0603" RESC1608X55X30ML15T15 54,68 r180 top
R18 "Generic RES 0603" RESC1608X55X30ML15T15 62,66 r0 top
R19 "Generic RES 0603" RESC1608X55X30LL15T15 84,83.1 r0 top
R20 "Generic RES 0603" RESC1608X55X30ML15T15 54,66 r0 top
R21 "100 KΩ,±1%,0402" RESC1005X40X25NL05T05 91.95,39.75 r180 top
R22 "Generic RES 0603" RESC1608X55X30LL15T15 36.3,5 r180 top
R23 "Generic RES 0603" RESC1608X55X30ML15T15 47,68.5 r180 top
R24 "Generic RES 0603" RESC1608X55X30LL15T15 36.8,3.175 r90 top
R25 "Generic RES 0603" RESC1608X55X30ML15T15 47,66.75 r0 top
R26 "100 KΩ,±1%,0402" RESC1005X40X25NL05T05 93.95,39.75 r180 top
R27 "Generic RES 0603" RESC1608X55X30ML15T15 107.66,83.225 r270 top
R28 "Generic RES 0603" RESC1608X55X30ML15T15 92.1,89.525 r90 top
R29 "Generic RES 0603" RESC1608X55X30LL15T15 105.25,84.5 r90 top
R30 "Generic RES 0603" RESC1608X55X30ML15T15 96.5,71.1 r90 top
R31 "Generic RES 0603" RESC1608X55X30ML15T15 99.085,80.841 r270 top
R32 "Generic RES 0603" RESC1608X55X30ML15T15 103.25,84.5 r90 top
R33 "100 KΩ,±1%,0402" RESC1005X40X25NL05T05 101.2,84.7 r90 top
R34 "Generic RES 0603" RESC1608X55X30ML15T15 94.75,84.475 r90 top
R35 "Generic RES 0603" RESC1608X55X30ML15T15 99.7,65.8 r0 top
R36 "Generic RES 0603" RESC1608X55X30ML15T15 92,83.25 r180 top
R37 "10 Ω,±1%,0402" RESC1005X40X25NL05T05 99.725,67.7 r180 top
R38 "Generic RES 0603" RESC1608X55X30ML15T15 78.5,70.725 r90 top
R39 "Generic RES 0603" RESC1608X55X30ML15T15 76.5,70.75 r90 top
R40 "Generic RES 0603" RESC1608X55X30ML15T15 82.1,71.5 r180 top
R41 "10 Ω,±1%,0402" RESC1005X40X25NL05T05 81.75,66.475 r270 top
R42 "Generic RES 0603" RESC1608X55X30ML15T15 98.7,63.2 r270 top
R43 "10 Ω,±1%,0402" RESC1005X40X25NL05T05 79,65.3 r0 top
R44 "Generic RES 0603" RESC1608X55X30ML15T15 93.5,68.275 r270 top
R45 "Generic RES 0603" RESC1608X55X30ML15T15 85.325,71.5 r180 top
R46 "Generic RES 0603" RESC1608X55X30ML15T15 71.225,65.5 r180 top
R47 "Generic RES 0603" RESC1608X55X30ML15T15 74.475,65.5 r0 top
R48 "Generic RES 0603" RESC1608X55X30ML15T15 73.25,69.25 r90 top
R49 "Generic RES 0603" RESC1608X55X30ML15T15 71.225,63.7 r0 top
R50 "Generic RES 0603" RESC1608X55X30ML15T15 78.1,93.525 r270 top
R51 "100 KΩ,±1%,0402" RESC1005X40X25NL05T05 59.75,14.45 r90 top
R52 "Generic RES 0603" RESC1608X55X30ML15T15 59.8,11.4 r270 top
R53 "Generic RES 0603" RESC1608X55X30ML15T15 41.767,11.416 r270 top
R54 "Generic RES 0603" RESC1608X55X30ML15T15 44.5,11.4 r270 top
R55 "Generic RES 0603" RESC1608X55X30ML15T15 47,11.4 r270 top
R56 "Generic RES 0603" RESC1608X55X30ML15T15 49.5,11.4 r270 top
R57 "Generic RES 0603" RESC1608X55X30ML15T15 41.75,14.45 r90 top
R58 "Generic RES 0603" RESC1608X55X30ML15T15 44.5,14.45 r90 top
R59 "Generic RES 0603" RESC1608X55X30ML15T15 47,14.425 r90 top
R60 "Generic RES 0603" RESC1608X55X30ML15T15 49.5,14.475 r90 top
R61 "10 Ω,±1%,0402" RESC1005X40X25NL05T05 38.525,17.25 r180 top
R62 "10 Ω,±1%,0402" RESC1005X40X25NL05T05 38.522,19.304 r180 top
R63 "100 KΩ,±1%,0402" RESC1005X40X25NL05T05 57,14.45 r90 top
R64 "Generic RES 0603" RESC1608X55X30ML15T15 57,11.4 r270 top
R65 "10 Ω,±1%,0402" RESC1005X40X25NL05T05 45.775,17.6 r180 top
R66 "10 Ω,±1%,0402" RESC1005X40X25NL05T05 45.775,19.6 r180 top
R67 "95.3 KΩ,±1%,0402" RESC1005X40X25NL05T05 55.1,87.2 r180 top
R68 "100 KΩ,±1%,0402" RESC1005X40X25NL05T05 101.5,106.55 r90 top
R69 "0.01 Ω,±1%,0402" RESC1005X40X25NL05T05 72.7,101.2 r180 top
R70 "10 Ω,±1%,0402" RESC1005X40X25NL05T05 72.1,102.7 r90 top
R71 "10 Ω,±1%,0402" RESC1005X40X25NL05T05 73.3,102.7 r90 top
R72 "PWR221T-30-33R0J" PWR221T3033R0J 88.2,102.2 r0 top
R73 "Generic RES 0603" RESC1608X55X30ML15T15 62.05,94.85 r90 top
R74 "PWR221T-30-33R0J" PWR221T3033R0J 88.2,107.4 r0 top
R75 "DNP KΩ,±1%,0402" RESC1005X40X25NL05T05 62.1,104.7 r270 top
R76 "Generic RES 0603" RESC1608X55X30ML15T15 64.8,95.275 r90 top
R77 "Generic RES 0603" RESC1608X55X30ML15T15 63.2,106.9 r90 top
R78 "Generic RES 0603" RESC1608X55X30LL15T15 55.4,106.075 r270 top
R79 "Generic RES 0603" RESC1608X55X30LL15T15 54.775,108.1 r0 top
R80 "Generic RES 0603" RESC1608X55X30ML15T15 67.65,107.2 r0 top
R81 "Generic RES 0603" RESC1608X55X30LL15T15 103.7,99.4 r180 top
R82 "100 KΩ,±1%,0402" RESC1005X40X25NL05T05 101.2,99.4 r0 top
R83 "Generic RES 0603" RESC1608X55X30LL15T15 65.7,86.7 r180 top
R84 "Generic RES 0603" RESC1608X55X30LL15T15 64.975,89.5 r180 top
R85 "1 MΩ,±1%,0402" RESC1005X40X25NL05T05 106.1,99.4 r180 top
R86 "Generic RES 0603" RESC1608X55X30ML15T15 85.5,91.2 r0 top
R87 "Generic RES 0603" RESC1608X55X30LL15T15 93.8,25.5 r90 top
R88 "Generic RES 0603" RESC1608X55X30LL15T15 110.8,96.7 r180 top
R89 "Generic RES 0603" RESC1608X55X30ML15T15 35.3,33.225 r90 top
R90 "Generic RES 0603" RESC1608X55X30ML15T15 61,57.375 r90 top
R91 "Generic RES 0603" RESC1608X55X30ML15T15 55,60.8 r0 top
R92 "Generic RES 0603" RESC1608X55X30ML15T15 65.75,49.475 r90 top
R93 "Generic RES 0603" RESC1608X55X30ML15T15 56.3,48.9 r270 top
R94 "Generic RES 0603" RESC1608X55X30ML15T15 66,45.125 r270 top
R95 "Generic RES 0603" RESC1608X55X30ML15T15 54.508,48.903 r270 top
R96 "Generic RES 0603" RESC1608X55X30ML15T15 63.7,47.4 r270 top
R97 "Generic RES 0603" RESC1608X55X30ML15T15 69,16.675 r90 top
R98 "Generic RES 0603" RESC1608X55X30ML15T15 98.125,15.6 r180 top
R99 "Generic RES 0603" RESC1608X55X30ML15T15 68.3,19.4 r180 top
R100 "Generic RES 0603" RESC1608X55X30ML15T15 98.225,18 r180 top
R101 "10 Ω,±1%,0402" RESC1005X40X25NL05T05 78,11.225 r270 top
R102 "10 Ω,±1%,0402" RESC1005X40X25NL05T05 80.9,11.175 r270 top
R103 "Generic RES 0603" RESC1608X55X30ML15T15 108.4,11.3 r270 top
R104 "10 Ω,±1%,0402" RESC1005X40X25NL05T05 86,11.225 r270 top
R105 "Generic RES 0603" RESC1608X55X30ML15T15 103.1,9.7 r270 top
R106 "Generic RES 0603" RESC1608X55X30ML15T15 104.7,9.725 r90 top
R107 "Generic RES 0603" RESC1608X55X30ML15T15 106.5,9.725 r90 top
R108 "Generic RES 0603" RESC1608X55X30ML15T15 88.2,21.825 r90 top
R109 "Generic RES 0603" RESC1608X55X30ML15T15 77.1,24.575 r90 top
R110 "Generic RES 0603" RESC1608X55X30ML15T15 69,13.3 r270 top
R111 "Generic RES 0603" RESC1608X55X30ML15T15 79.75,23.25 r90 top
R112 "Generic RES 0603" RESC1608X55X30ML15T15 70.7,39.175 r90 top
R113 "Generic RES 0603" RESC1608X55X30ML15T15 96.075,47.5 r0 top
R114 "Generic RES 0603" RESC1608X55X30ML15T15 70.7,42.225 r90 top
R115 "Generic RES 0603" RESC1608X55X30ML15T15 98.7,46.9 r270 top
R116 "Generic RES 0603" RESC1608X55X30ML15T15 153.5,31.825 r90 top
R117 "Generic RES 0603" RESC1608X55X30ML15T15 154.175,29.1 r0 top
R118 "Generic RES 0603" RESC1608X55X30ML15T15 144.1,29.725 r90 top
R119 "Generic RES 0603" RESC1608X55X30ML15T15 141.625,39.8 r180 top
R120 "Generic RES 0603" RESC1608X55X30ML15T15 146,29.725 r90 top
R121 "Generic RES 0603" RESC1608X55X30ML15T15 143.2,52.1 r180 top
R122 "Generic RES 0603" RESC1608X55X30ML15T15 145,41.75 r180 top
R123 "Generic RES 0603" RESC1608X55X30ML15T15 48.6,83.7 r90 top
R124 "Generic RES 0603" RESC1608X55X30ML15T15 40.7,95 r180 top
R125 "Generic RES 0603" RESC1608X55X30ML15T15 48.1,94 r270 top
R126 "Generic RES 0603" RESC1608X55X30ML15T15 43.55,95.8 r180 top
R127 "10 Ω,±1%,0402" RESC1005X40X25NL05T05 47.3,103.7 r90 top
R128 "0.01 Ω,±1%,0402" RESC1005X40X25NL05T05 40.3,101 r0 top
R129 "0.01 Ω,±1%,0402" RESC1005X40X25NL05T05 40.3,102 r0 top
R130 "Generic RES 0603" RESC1608X55X30ML15T15 47.1,106.325 r270 top
R131 "Generic RES 0603" RESC1608X55X30ML15T15 48.2,100.825 r90 top
R132 "Generic RES 0603" RESC1608X55X30ML15T15 35.3,36.4 r90 top
R133 "Generic RES 0603" RESC1608X55X30ML15T15 85.5,92.9 r0 top
R134 "Generic RES 0603" RESC1608X55X30ML15T15 85.5,94.5 r0 top
R135 "DNP,±1%,0402" RESC1005X40X25NL05T05 135.4,14.9 r0 top
R136 "DNP,±1%,0402" RESC1005X40X25NL05T05 135.2,18.7 r0 top
R137 "Generic RES 0603" RESC1608X55X30LL15T15 99.7,70.3 r180 top
R138 "10 Ω,±1%,0402" RESC1005X40X25NL05T05 37.5,33.45 r270 top
R139 "Generic RES 0603" RESC1608X55X30ML15T15 48.8,31.2 r270 top
R140 "Generic RES 0603" RESC1608X55X30ML15T15 46.3,32.525 r270 top
R141 "Generic RES 0603" RESC1608X55X30ML15T15 78.4,64 r0 top
R142 "Generic RES 0603" RESC1608X55X30ML15T15 44.2,40.2 r0 top
R143 "Generic RES 0603" RESC1608X55X30LL15T15 62.8,84.1 r180 top
R144 "Generic RES 0603" RESC1608X55X30ML15T15 59,59.8 r180 top
R145 "Generic RES 0603" RESC1608X55X30ML15T15 44.3,42.9 r180 top
R146 "Generic RES 0603" RESC1608X55X30LL15T15 35.3,57.7 r90 top
R147 "Generic RES 0603" RESC1608X55X30ML15T15 144.4,97 r180 top
R148 "Generic RES 0603" RESC1608X55X30ML15T15 144.4,101.6 r180 top
R149 "Generic RES 0603" RESC1608X55X30ML15T15 120.3,100.6 r180 top
R150 "Generic RES 0603" RESC1608X55X30ML15T15 120.3,97.6 r180 top
R151 "Generic RES 0603" RESC1608X55X30ML15T15 144.4,99.4 r180 top
R152 "Generic RES 0603" RESC1608X55X30ML15T15 144.4,103.9 r180 top
R153 "Generic RES 0603" RESC1608X55X30ML15T15 132.6,88.5 r0 top
R154 "Generic RES 0603" RESC1608X55X30ML15T15 120.3,95 r180 top
R155 "Generic RES 0603" RESC1608X55X30ML15T15 129.9,106.7 r90 top
R156 "Generic RES 0603" RESC1608X55X30ML15T15 137.5,106.7 r90 top
R157 "Generic RES 0603" RESC1608X55X30ML15T15 125.5,88.5 r0 top
R158 "Generic RES 0603" RESC1608X55X30ML15T15 144.4,94.6 r180 top
R159 "Generic RES 0603" RESC1608X55X30ML15T15 120.3,102.9 r0 top
R160 "Generic RES 0603" RESC1608X55X30ML15T15 124.9,106.8 r90 top
R161 "Generic RES 0603" RESC1608X55X30ML15T15 150.7,9.7 r180 top
R162 "Generic RES 0603" RESC1608X55X30ML15T15 136.1,88.5 r180 top
R163 "Generic RES 0603" RESC1608X55X30ML15T15 150.725,12.1 r180 top
R164 "Generic RES 0603" RESC1608X55X30ML15T15 150.7,14.5 r180 top
R165 "Generic RES 0603" RESC1608X55X30ML15T15 144.4,106.2 r180 top
R166 "Generic RES 0603" RESC1608X55X30ML15T15 133.7,106.7 r90 top
R167 "Generic RES 0603" RESC1608X55X30ML15T15 140.1,106.7 r270 top
R168 "Generic RES 0603" RESC1608X55X30ML15T15 150.7,7.3 r180 top
R169 "Generic RES 0603" RESC1608X55X30ML15T15 137.8,5.7 r90 top
R170 "Generic RES 0603" RESC1608X55X30ML15T15 137.8,9.3 r90 top
R171 "Generic RES 0603" RESC1608X55X30ML15T15 129.1,88.5 r0 top
RL1 "Coto C241S" PCB-o1m8470la7x8r6xoffbd-1 102.4,74.8 r90 top
RL2 "Coto C241S" PCB-o1m8470la7x8r6xoffbd-1 71.7,87.9 r270 top
RL3 "Coto C241S" PCB-o1m8470la7x8r6xoffbd-1 106,19.4 r180 top
SW1 "TP11CGRA004" PCB-kxc5zoxy62rh6gxl0cji-1 7.2,10.12 r90 top
SW2 "C&K Components FDSD002R" FDSD002r 11.6,2.1 r90 top
SW3 "TP11CGRA004" PCB-kxc5zoxy62rh6gxl0cji-1 7.2,19.3 r90 top
TP1 "Test Point Pad" PCB-w5299rxaittb4m04ntfs-1 88.9,39.2 r90 top
TP2 "Molex 90120-0761" PCB-u1j2a009byds4mriae4x-1 70.7,36.2 r90 top
TP3 "Molex 90120-0761" PCB-u1j2a009byds4mriae4x-1 93.3,47.5 r90 top
TP4 "Test Point Pad" PCB-w5299rxaittb4m04ntfs-1 101.3,8.4 r90 top
TP5 "Test Point Pad" PCB-w5299rxaittb4m04ntfs-1 108.1,8.9 r90 top
TPG1 "Test Point Pad" PCB-w5299rxaittb4m04ntfs-1 111.5,108.5 r90 top
TPG2 "Test Point Pad" PCB-w5299rxaittb4m04ntfs-1 158.2,63.9 r90 top
U1 "Adafruit Industries TEENSY41" "Adafruit Industries TEENSY41-Footprint-1" 25.12,31.59 r180 top
U2 "TPS7A4901DRBR" TI-DRB8-1750X1500TP_V 61.925,72.225 r90 top
U3 "TPS7A4901DRBR" TI-DRB8-1750X1500TP_V 81.6,88.8 r90 top
U4 "TPS7A4901DRBR" TI-DRB8-1750X1500TP_V 54.319,72.34 r90 top
U5 "TLV75901PDRVR" PCB-ude52gq66msu1251nhm5-1 35.475,6.35 r0 top
U6 "TLV75901PDRVR" PCB-ude52gq66msu1251nhm5-1 46.125,70.2 r0 top
U7 "LM27761DSGT" PCB-4n89rivuw3spi8alca02-1 92.6,41.85 r0 top
U8 "LTM8052IV#PBF" LT-LGA-81-15000X11250X2820_V 101.73,92.095 r270 top
U9 "INA226AIDGST" TSSOP10 113.56,83.4 r180 top
U10 "Texas Instruments TXS0102DCTT" PCB-19361507-1 77.5,59.75 r90 top
U11 "Maxim Integrated MAX11311GTJ+" PCB-s1hzzxkmij8s4b201del-1 86.025,62.368 r0 top
U12 "TLV75901PDRVR" PCB-ude52gq66msu1251nhm5-1 70.125,68.2 r0 top
U13 "INA226AIDGST" TSSOP10 72.6,93.1 r0 top
U14 "TI SN74LVC1G14DBVR" TI-DBV5_M 58.05,18.3 r90 top
U15 "TI SN74LVC1G14DBVR" TI-DBV5_M 53.9,18.3 r90 top
U16 "LMR50410XDBVR" PCB-b726so6zuq7w9f75ocqz-1 55.8,90.2 r90 top
U17 "Texas Instruments TPS55289RYQR" DSG8-1600X900TP 63,100.1 r0 top
U18 "TCA9406DCUR" DCU8_L 57.7,56.7 r0 top
U19 "Maxim Integrated MAX11311GTJ+" PCB-s1hzzxkmij8s4b201del-1 56.175,41.368 r0 top
U20 "Maxim Integrated MAX11311GTJ+" PCB-s1hzzxkmij8s4b201del-1 87.175,29.332 r180 top
U21 "Maxim Integrated MAX11311GTJ+" PCB-s1hzzxkmij8s4b201del-1 138.618,49.425 r270 top
U22 "Texas Instruments TMP1075DSGR" PCB-22psa42mhiow8cw0mt2a-1 13.35,16.45 r270 top
U23 "Maxim Integrated MAX11311GTJ+" PCB-s1hzzxkmij8s4b201del-1 38.575,26.068 r0 top
U24 "REF3425IDBVR" PCB-iii9p4hirjo0din0ylk5-1 98.6,33.5 r180 top
U25 "STMicroelectronics STLINK-V3MODS" "STMicroelectronics STLINK-V3MODS-Footprint-1" 131.8,0.95 r180 top
U26 "TLV75901PDRVR" PCB-ude52gq66msu1251nhm5-1 54.1,105.35 r90 top
U27 "Maxim Integrated MAX11311GTJ+" PCB-s1hzzxkmij8s4b201del-1 129.925,67.668 r0 top
U28 "Infineon Technologies AG CYPD3176-24LQXQT" QFN-24_N 44.3,99.8 r90 top
U29 "LMV761MFX/NOPB" MF06A_N 106.4,102.2 r0 top
U30 "TI SN74LVC1G14DBVR" TI-DBV5_M 154.9,11 r0 top
U31 "TI SN74LVC1G14DBVR" TI-DBV5_M 144.5,90 r90 top
U32 "TI SN74LVC1G14DBVR" TI-DBV5_M 120.2,90.8 r90 top

## Footprints (in the part's own frame and the unit in brackets; to place one, negate y for a bottom-side part, rotate by r counter-clockwise, add the part's x,y. Pads: shape width x height; smd on the part's side, far side on the other; paste and mask are expansions set on the pad)
0603D_C [mil]
  rect 35x32 smd: 1(-30,0) 2(30,0)
  silkscreen extent -57,-25 65,25, body extent -31,-16 31,16, height 31
"Adafruit Industries TEENSY41-Footprint-1" [mil]
  round 70 hole 38: 0(-300,1150) 1(-300,1050) 2(-300,950) 3(-300,850) 4(-300,750) 5(-300,650) 6(-300,550) 7(-300,450) 8(-300,350) 9(-300,250) 10(-300,150) 11(-300,50) 12(-300,-50) 13(-300,-150) 14(-300,-250) 15(-300,-350) 16(-300,-450) 17(-300,-550) 18(-300,-650) 19(-300,-750) 20(-300,-850) 21(-300,-950) 22(-300,-1050) 23(-300,-1150) 24(300,-1150) 25(300,-1050) 26(300,-950) 27(300,-850) 28(300,-750) 29(300,-650) 30(300,-550) 31(300,-450) 32(300,-350) 33(300,-250) 34(300,-150) 35(300,-50) 36(300,50) 37(300,150) 38(300,250) 39(300,350) 40(300,450) 41(300,550) 42(300,650) 43(300,750) 44(300,850) 45(300,950) 46(300,1050) 47(300,1150) 48(-180,900) 49(-180,800) 50(-180,700) 51(-180,600) 52(-180,500) 53(200,-650) 54(100,-650) 55(0,-650) 56(-100,-650) 57(-200,-650) 58(200,1050)
  round 60 hole 30: 59(46.06,560.63) 60(46.06,639.37) 61(203.54,639.37) 62(203.54,560.63) 63(124.8,639.37) 64(124.8,560.63)
  silkscreen extent -350,-1375 350,1275, body extent -350,-1361 350,1259, height 261
CAPC1005X56X25NL10T15 [mm]
  rect 0.68x0.64 smd: 1(-0.44,0) 2(0.44,0)
  body extent -0.55,-0.3 0.55,0.3, height 0.56
CAPC1608X90X35ML15T15 [mm]
  rect 1.25x1.1 smd: 1(-0.85,0) 2(0.85,0)
  body extent -0.88,-0.48 0.87,0.48, height 0.9
CAPC1608X90X35NL15T15 [mm]
  rect 1.05x1 smd: 1(-0.75,0) 2(0.75,0)
  body extent -0.88,-0.48 0.87,0.48, height 0.9
CAPC3216X180X55LL20T25 [mm]
  rect 1.15x1.7 smd: 1(-1.275,0) 2(1.275,0)
  silkscreen extent -0.3,-0.75 0.3,0.75, body extent -1.7,-0.9 1.7,0.9, height 1.8
DCU8_L [mm]
  oval 0.65x0.3 smd: 1(-1.525,0.75) 2(-1.525,0.25) 3(-1.525,-0.25) 4(-1.525,-0.75) 5(1.525,-0.75) 6(1.525,-0.25) 7(1.525,0.25) 8(1.525,0.75)
  silkscreen extent -1.65,-1.05 0.8,1.57, body extent -1.2,-1.05 1.2,1.05, height 0.9
DFN2020-8D [mm] "SON, 6-Leads, Body 2.1x2.1mm, Pitch 0.65mm, 2X Thermal Pad 0.67x1 mm, IPC Medium Density"
  rect 0.45x0.45 smd mask+0.051: 1(-0.875,0.65) 2(-0.875,0) 3(-0.875,-0.65) 4(0.875,-0.65) 5(0.875,0) 6(0.875,0.65)
  rect 1.05x0.72 smd mask+0.051: 3(0,-0.515) 6(0,0.515)
  silkscreen extent -1.5,-1.2 1.05,1.25, body extent -1.05,-1.05 1.05,1.05, height 0.65
DSG8-1600X900TP [mm]
  rrect50% 0.25x0.6 smd mask+0.06: 1(-0.75,-2.4) 2(-0.25,-2.4) 3(0.25,-2.4) 4(0.75,-2.4) 14(0.75,2.4) 15(0.3,2.4) 16(-0.2,2.4) 17(-0.7,2.4)
  rrect50% 0.6x0.25 smd mask+0.06: 5(1.4,-2.04) 6(1.4,-1.54) 12(1.4,1.54) 13(1.4,2.04) 18(-1.4,2.04) 19(-1.4,1.54) 20(-1.4,-1.54) 21(-1.4,-2.04)
  rrect50% 3.4x0.3 smd mask+0.06: 7(0,-1.04) 8(0,-0.54) 9(0,0) 10(0,0.54) 11(0,1.04)
  silkscreen extent -1.45,-2.95 1.2,2.9, body extent -1.3,-2.5 1.4,2.3, height 0.8
FDSD002r [mm]
  rect 0.5x0.85 smd: A(-1.5,-1.625) B(-1.5,1.625)
  rect 0.5x1 smd: C(1.5,-1.7) D(1.5,1.7)
  body extent -4.6,-1.8 1.9,1.8, height 1.2
HEADER8X2 [mm]
  rect 1.45x1.45 hole 1.016: 1(0,0)
  round 1.45 hole 1.016: 2(2.54,0) 3(0,-2.54) 4(2.54,-2.54) 5(0,-5.08) 6(2.54,-5.08) 7(0,-7.62) 8(2.54,-7.62) 9(0,-10.16) 10(2.54,-10.16) 11(0,-12.7) 12(2.54,-12.7) 13(0,-15.24) 14(2.54,-15.24) 15(0,-17.78) 16(2.54,-17.78)
  silkscreen extent 1.02,-19.05 1.52,1.27, body extent -1.23,-19.05 3.77,1.27, height 8.59
LT-LGA-81-15000X11250X2820_V [mm]
  round 0.63 smd: A1(-4.445,6.35) A2(-3.175,6.35) A3(-1.905,6.35) A4(-0.635,6.35) A5(0.635,6.35) A6(1.905,6.35) A7(3.175,6.35) A8(4.445,6.35) B1(-4.445,5.08) B2(-3.175,5.08) B3(-1.905,5.08) B4(-0.635,5.08) B5(0.635,5.08) B6(1.905,5.08) B7(3.175,5.08) B8(4.445,5.08) C1(-4.445,3.81) C2(-3.175,3.81) C3(-1.905,3.81) C4(-0.635,3.81) C5(0.635,3.81) C6(1.905,3.81) C7(3.175,3.81) C8(4.445,3.81) D1(-4.445,2.54) D2(-3.175,2.54) D3(-1.905,2.54) D4(-0.635,2.54) D5(0.635,2.54) D6(1.905,2.54) D7(3.175,2.54) D8(4.445,2.54) E1(-4.445,1.27) E2(-3.175,1.27) E3(-1.905,1.27) E4(-0.635,1.27) E5(0.635,1.27) E6(1.905,1.27) E7(3.175,1.27) E8(4.445,1.27) F1(-4.445,0) F2(-3.175,0) F3(-1.905,0) F4(-0.635,0) F5(0.635,0) F6(1.905,0) F7(3.175,0) F8(4.445,0) G1(-4.445,-1.27) G2(-3.175,-1.27) G3(-1.905,-1.27) G4(-0.635,-1.27) G5(0.635,-1.27) G6(1.905,-1.27) G7(3.175,-1.27) G8(4.445,-1.27) H5(0.635,-2.54) H6(1.905,-2.54) H7(3.175,-2.54) H8(4.445,-2.54) J1(-4.445,-3.81) J2(-3.175,-3.81) J3(-1.905,-3.81) J5(0.635,-3.81) J6(1.905,-3.81) J7(3.175,-3.81) J8(4.445,-3.81) K1(-4.445,-5.08) K2(-3.175,-5.08) K3(-1.905,-5.08) K5(0.635,-5.08) K6(1.905,-5.08) K7(3.175,-5.08) K8(4.445,-5.08) L1(-4.445,-6.35) L2(-3.175,-6.35) L3(-1.905,-6.35) L5(0.635,-6.35) L6(1.905,-6.35) L7(3.175,-6.35) L8(4.445,-6.35)
  silkscreen extent -6.35,-7.5 5.63,7.5, body extent -5.63,-7.5 5.63,7.5, height 2.92
MF06A_N [mm]
  rect 1.1x0.6 smd: 1(-1.3,0.95) 2(-1.3,0) 3(-1.3,-0.95) 4(1.3,-0.95) 5(1.3,0) 6(1.3,0.95)
  silkscreen extent -1.32,-1.5 0.25,1.95, body extent -1.4,-1.45 1.4,1.45, height 1.2
PCB-3ir64hapazioc2jy0mm2-1 [mm]
  rect 1x2 smd: 1(-0.9,0) 2(0.9,0)
  body extent -1.1,-0.9 1.1,0.9, height 1.05
PCB-4n89rivuw3spi8alca02-1 [mm]
  rect 0.5x0.28 smd paste-0.14 mask+0.07: 1(-0.95,0.75) 2(-0.95,0.25) 3(-0.95,-0.25) 4(-0.95,-0.75) 5(0.95,-0.75) 6(0.95,-0.25) 7(0.95,0.25) 8(0.95,0.75)
  rect 0.9x1.6 smd paste-0.45 mask+0.07: 9(0,0)
  silkscreen extent -1.5,-1.2 1.05,1.25, body extent -1.05,-1.05 1.05,1.05, height 0.8
PCB-5fu3j7c0qqekthrt71i6-1 [mm]
  rect 0.7x0.9 smd: 1(-0.75,0) 2(0.75,0)
  silkscreen extent -1.4,-0.76 1.4,0.76, body extent -0.8,-0.4 0.8,0.4, height 0.7
PCB-22psa42mhiow8cw0mt2a-1 [mm]
  rrect40% 0.5x0.25 smd mask+0.05: 1(-0.95,0.75) 2(-0.95,0.25) 3(-0.95,-0.25) 4(-0.95,-0.75) 5(0.95,-0.75) 6(0.95,-0.25) 7(0.95,0.25) 8(0.95,0.75)
  rrect10% 0.9x1.6 smd paste-0.45 mask+0.05: 9(0,0)
  silkscreen extent -1.1,-1.1 1.1,1.25, body extent -1.05,-1.05 1.05,1.05, height 0.8
PCB-19361507-1 [mm]
  oval 1.8x0.35 smd mask+0.05: 1(-1.8,0.975) 2(-1.8,0.325) 3(-1.8,-0.325) 4(-1.8,-0.975) 5(1.8,-0.975) 6(1.8,-0.325) 7(1.8,0.325) 8(1.8,0.975)
  silkscreen extent -1.92,-1.57 0.5,1.82, body extent -1.45,-1.57 1.45,1.58, height 1.3
PCB-b726so6zuq7w9f75ocqz-1 [mm]
  rect 0.9x0.65 smd: 1(-1.2,0.95) 2(-1.2,0) 3(-1.2,-0.95) 4(1.2,-0.95) 5(1.2,0) 6(1.2,0.95)
  silkscreen extent -1.32,-1.55 0.35,1.95, body extent -0.9,-1.55 0.9,1.55, height 1.45
PCB-bfde39zrvmm7lhgxtykn-1 [mm]
  round 2 hole 1.4: 1(0,0)
  round 2 hole 1.2: 2(-2.54,2.542) 2(-2.54,-2.539) 2(2.54,2.541) 2(2.54,-2.537)
  silkscreen extent -3.17,-3.18 3.18,11.56, body extent -3.18,-3.17 3.18,11.63, height 10.1
PCB-bfdufqe5asedaz2dexug-1 [mm]
  round 1.8 hole 1.3: 1(3.175,3.175)
  round 2.5 hole 1.5: 2(0,0) 2(0,6.35) 2(6.35,0) 2(6.35,6.35)
  silkscreen extent -1.65,-1.65 8,8, body extent -2.73,-2.73 9.08,9.08, height 14.2
PCB-frzzw7wnfsmgwg7mpl31-1 [mil]
  round 60 hole 40: 1(-50,50) 2(50,50) 3(150,50) 4(250,50)
  silkscreen extent -110,-10 310,110
PCB-h3ow9p0wpqltbs651onh-1 [mil]
  rect 65x65 hole 42: 1(-450,-50)
  round 65 hole 42: 2(-450,50) 3(-350,-50) 4(-350,50) 5(-250,-50) 6(-250,50) 7(-150,-50) 8(-150,50) 10(-50,50) 11(50,-50) 12(50,50) 13(150,-50) 14(150,50) 15(250,-50) 16(250,50) 17(350,-50) 18(350,50) 19(450,-50) 20(450,50)
  round 65 hole 43.31: 9(-50,-50)
  silkscreen extent -655,-170 650,185, body extent -651,-170 651,186, height 353
PCB-iii9p4hirjo0din0ylk5-1 [mm]
  rect 1.3x0.7 smd: 1(-1.2,0.95) 2(-1.2,0) 3(-1.2,-0.95) 4(1.2,-0.95) 5(1.2,0) 6(1.2,0.95)
  silkscreen extent -1.33,-1.55 0.15,1.97, body extent -0.9,-1.55 0.9,1.55, height 1.45
PCB-kxc5zoxy62rh6gxl0cji-1 [mil]
  rrect50% 50x60 hole 30 slot 43 at 90 deg: 1(0,0) 2(200,0) 3(0,200) 3(200,200)
  body extent -65,-15 255,465, height 60
PCB-ld6ppm2v3fcnldhcn63r-1 [mm]
  oval 1x2.1 hole 0.6 slot 1.7 at 90 deg mask+0.102: 1(0,6.78) 1(8.64,6.78)
  oval 1x1.6 hole 0.6 slot 1.2 at 90 deg mask+0.102: 1(0,2.6) 1(8.64,2.6)
  rect 1x0.7 smd: 2(0.8,4.5) 2(7.9,4.5)
  round 0 hole 0.65 unplated paste-2539.97: 3(1.43,6.28) 3(7.21,6.28)
  rect 0.6x1.4 smd: A1B12(1.12,7.47) A4B9(1.92,7.47) A9B4(6.72,7.47) A12B1(7.52,7.47)
  rect 0.3x1.4 smd: A5(3.07,7.47) A6(4.07,7.47) A7(4.57,7.47) A8(2.57,7.47) B5(6.07,7.47) B6(5.07,7.47) B7(3.57,7.47) B8(5.57,7.47)
  silkscreen extent 0,0.07 8.7,5.3, body extent -0.1,0 8.84,7.9, height 3.21
PCB-mw0ri1kelkujqd8k45jk-1 [mil]
  rect 76x256 smd: 1(-95,0) 2(95,0)
  body extent -142,-148 142,148, height 276
PCB-nk6cd1c3p7lqby8wsdwb-1 [mil]
  rect 65x65 hole 42: 1(-445,-45)
  round 65 hole 42: 2(-445,55) 3(-345,-45) 4(-345,55) 5(-245,-45) 6(-245,55) 7(-145,-45) 8(-145,55) 9(-45,-45) 10(-45,55) 11(55,-45) 12(55,55) 13(155,-45) 14(155,55) 15(255,-45) 16(255,55) 17(355,-45) 18(355,55) 19(455,-45) 20(455,55)
  silkscreen extent -495,-95 505,105, body extent -495,-95 505,105, height 335
PCB-nx47vqovjjduu8dkc1uz-1 [mil]
  rect 60x60 hole 38: 1(-50,0)
  round 60 hole 38: 2(50,0)
  silkscreen extent -100,-46 100,46, body extent -100,-46 100,46, height 330
PCB-o1m8470la7x8r6xoffbd-1 [mm]
  rect 1.2x2 smd: 1(-1.27,-3.4) 2(1.27,-3.4) 3(1.27,3.4) 4(-1.27,3.4)
  silkscreen extent -2.4,-3.2 2.4,3.2, body extent -2.15,-3.4 2.15,3.4, height 2.01
PCB-s1hzzxkmij8s4b201del-1 [mm]
  oval 0.2x0.6 smd: 1(1.425,0.582) 2(1.925,0.582) 3(2.425,0.582) 4(2.925,0.582) 5(3.425,0.582) 6(3.925,0.582) 7(4.425,0.582) 8(4.925,0.582) 17(4.925,5.682) 18(4.425,5.682) 19(3.925,5.682) 20(3.425,5.682) 21(2.925,5.682) 22(2.425,5.682) 23(1.925,5.682) 24(1.425,5.682)
  oval 0.6x0.2 smd: 9(5.725,1.382) 10(5.725,1.882) 11(5.725,2.382) 12(5.725,2.882) 13(5.725,3.382) 14(5.725,3.882) 15(5.725,4.382) 16(5.725,4.882) 25(0.625,4.882) 26(0.625,4.382) 27(0.625,3.882) 28(0.625,3.382) 29(0.625,2.882) 30(0.625,2.382) 31(0.625,1.882) 32(0.625,1.382)
  rect 3.6x3.6 smd: 33(3.175,3.132)
  silkscreen extent 0.53,-0.29 5.82,5.78, body extent 0.67,0.63 5.68,5.63, height 1
PCB-u1j2a009byds4mriae4x-1 [mil]
  round 60 hole 30: 1(0,0)
PCB-ude52gq66msu1251nhm5-1 [mm]
  rect 0.3x0.7 smd: 1(0,0) 2(0.65,0) 3(1.3,0) 4(1.3,2.1) 5(0.65,2.1) 6(0,2.1)
  rect 1.4x0.8 smd: 7(0.625,1.05)
  silkscreen extent -1.14,0 1.78,2.16
PCB-w5299rxaittb4m04ntfs-1 [mm]
  round 0.635 smd: 1(0,0)
PCB-zc2vv3u4p0giaiwimi3e-1 [mm]
  rect 0.8x0.8 smd: 1(-0.8,0) 2(0.8,0)
  silkscreen extent -1.4,-0.64 1.4,0.64, body extent -0.8,-0.4 0.8,0.4, height 0.7
PWR221T3033R0J [mm]
  rect 1.431x1.431 hole 0.92: 1(0,0)
  round 1.431 hole 0.92: 2(5.08,0)
  silkscreen extent -2.67,-1.79 7.75,1.95, body extent -2.67,-1.79 7.75,1.39, height 19.4
QFN-24_N [mm]
  oval 0.75x0.25 smd: 1(-2.025,1.25) 2(-2.025,0.75) 3(-2.025,0.25) 4(-2.025,-0.25) 5(-2.025,-0.75) 6(-2.025,-1.25) 13(2.025,-1.25) 14(2.025,-0.75) 15(2.025,-0.25) 16(2.025,0.25) 17(2.025,0.75) 18(2.025,1.25)
  oval 0.25x0.75 smd: 7(-1.25,-2.025) 8(-0.75,-2.025) 9(-0.25,-2.025) 10(0.25,-2.025) 11(0.75,-2.025) 12(1.25,-2.025) 19(1.25,2.025) 20(0.75,2.025) 21(0.25,2.025) 22(-0.25,2.025) 23(-0.75,2.025) 24(-1.25,2.025)
  rect 2.7x2.7 smd paste-1.35: 25(0,0)
  silkscreen extent -3,-2.22 2.22,2.22, body extent -2.07,-2.07 2.07,2.07, height 0.8
RESC1005X40X25NL05T05 [mm]
  rect 0.55x0.55 smd: 1(-0.45,0) 2(0.45,0)
  body extent -0.53,-0.27 0.53,0.28, height 0.4
RESC1608X55X30LL15T15 [mm]
  rect 0.7x0.85 smd: 1(-0.625,0) 2(0.625,0)
  body extent -0.87,-0.48 0.87,0.48, height 0.55
RESC1608X55X30ML15T15 [mm]
  rect 0.9x1.05 smd: 1(-0.725,0) 2(0.725,0)
  body extent -0.87,-0.48 0.87,0.48, height 0.55
SODFL4724X103N [mm]
  rect 1.1x1.88 smd: 1(-2.075,0) 2(2.075,0)
  silkscreen extent -2.63,-1.2 1.9,1.2, body extent -2.35,-1.2 2.35,1.2, height 1.03
"STMicroelectronics STLINK-V3MODS-Footprint-1" [mm]
  rrect10% 1.9x1.07 smd: 1(0,0) 2(0,-1.27) 3(0,-2.54) 4(0,-3.81) 5(0,-5.08) 6(0,-6.35) 7(0,-7.62) 8(0,-8.89) 9(0,-10.16) 10(0,-11.43) 11(0,-12.7) 12(0,-13.97) 13(0,-15.24) 14(0,-16.51) 15(0,-17.78) 16(0,-19.05) 17(14.64,-19.05) 18(14.64,-17.78) 19(14.64,-16.51) 20(14.64,-15.24) 21(14.64,-13.97) 22(14.64,-12.7) 23(14.64,-11.43) 24(14.64,-10.16) 25(14.64,-8.89) 26(14.64,-7.62) 27(14.64,-6.35) 28(14.64,-5.08) 29(14.64,-3.81) 30(14.64,-2.54) 31(14.64,-1.27) 32(14.64,0)
  silkscreen extent -0.64,-20.32 15.24,10.92, body extent -0.32,-20.09 14.92,11.58, height 4.55
TI-DBV5_M [mm]
  rect 1.3x0.7 smd: 1(-1.2,0.95) 2(-1.2,0) 3(-1.2,-0.95) 4(1.2,-0.95) 5(1.2,0.95)
  silkscreen extent -1.32,-1.55 0.15,1.97, body extent -1.4,-1.45 1.4,1.45, height 1.45
TI-DRB8-1750X1500TP_V [mm]
  rect 0.85x0.35 smd: 1(-1.475,0.975) 2(-1.475,0.325) 3(-1.475,-0.325) 4(-1.475,-0.975) 5(1.475,-0.975) 6(1.475,-0.325) 7(1.475,0.325) 8(1.475,0.975)
  rect 0.23x0.89 smd: 9(-0.34,1.319) 9(-0.34,-1.221) 9(0.295,1.319) 9(0.295,-1.221)
  rect 1.5x1.75 smd: 9(0,0)
  silkscreen extent -2.02,-1.58 1.57,1.62, body extent -1.5,-1.5 1.5,1.5, height 1
TSSOP10 [mm]
  rect 1.45x0.3 smd: 1(-2.2,1) 2(-2.2,0.5) 3(-2.2,0) 4(-2.2,-0.5) 5(-2.2,-1) 6(2.2,-1) 7(2.2,-0.5) 8(2.2,0) 9(2.2,0.5) 10(2.2,1)
  silkscreen extent -1.91,-1.4 1.02,1.78, body extent -2.46,-1.5 2.46,1.5, height 1.1
"Wurth Elektronik 150060RS75003-Footprint-1" [mm]
  rect 0.8x0.8 smd: 1(-0.8,0) 2(0.8,0)
  silkscreen extent -1.5,-0.3 -1.5,0.3, body extent -0.8,-0.4 0.8,0.4, height 0.7